# Altium PCB Trung PX4 Flight Controller PCB.PcbDoc (part 1 of 2)
Units mm, origin at the board's own origin, x right, y up, seen from the top; angles counter-clockwise.
Board outline 69.46 x 68.69 mm, 4 copper layers (Top Signal, Power, GND, Bottom Signal), stack 1.683 mm thick; 113 components, 114 nets, 501 pads, 234 vias.
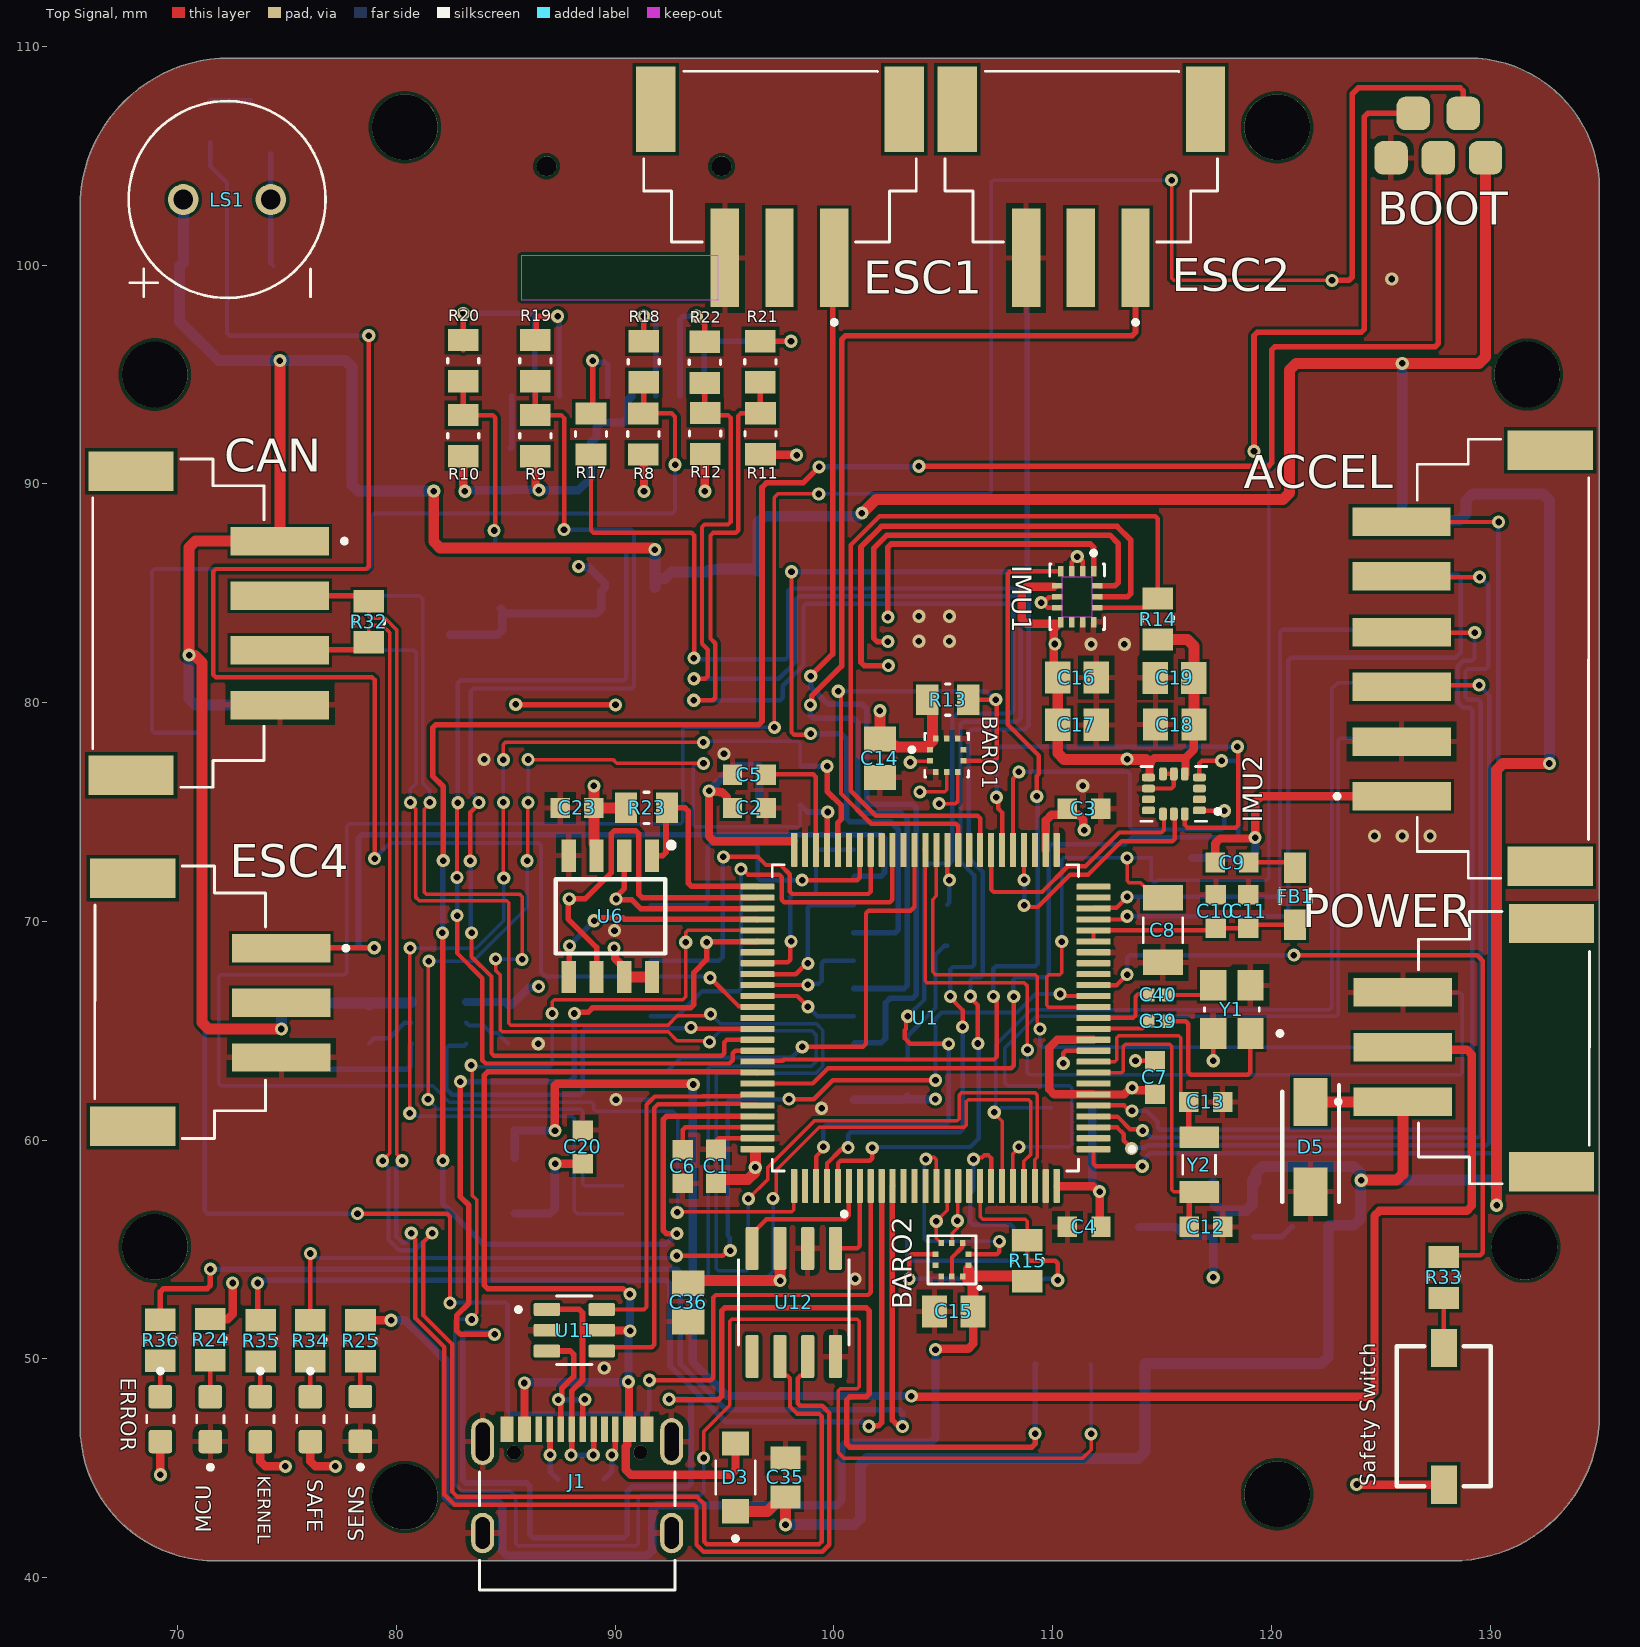
[diagram p0: Top Signal view]
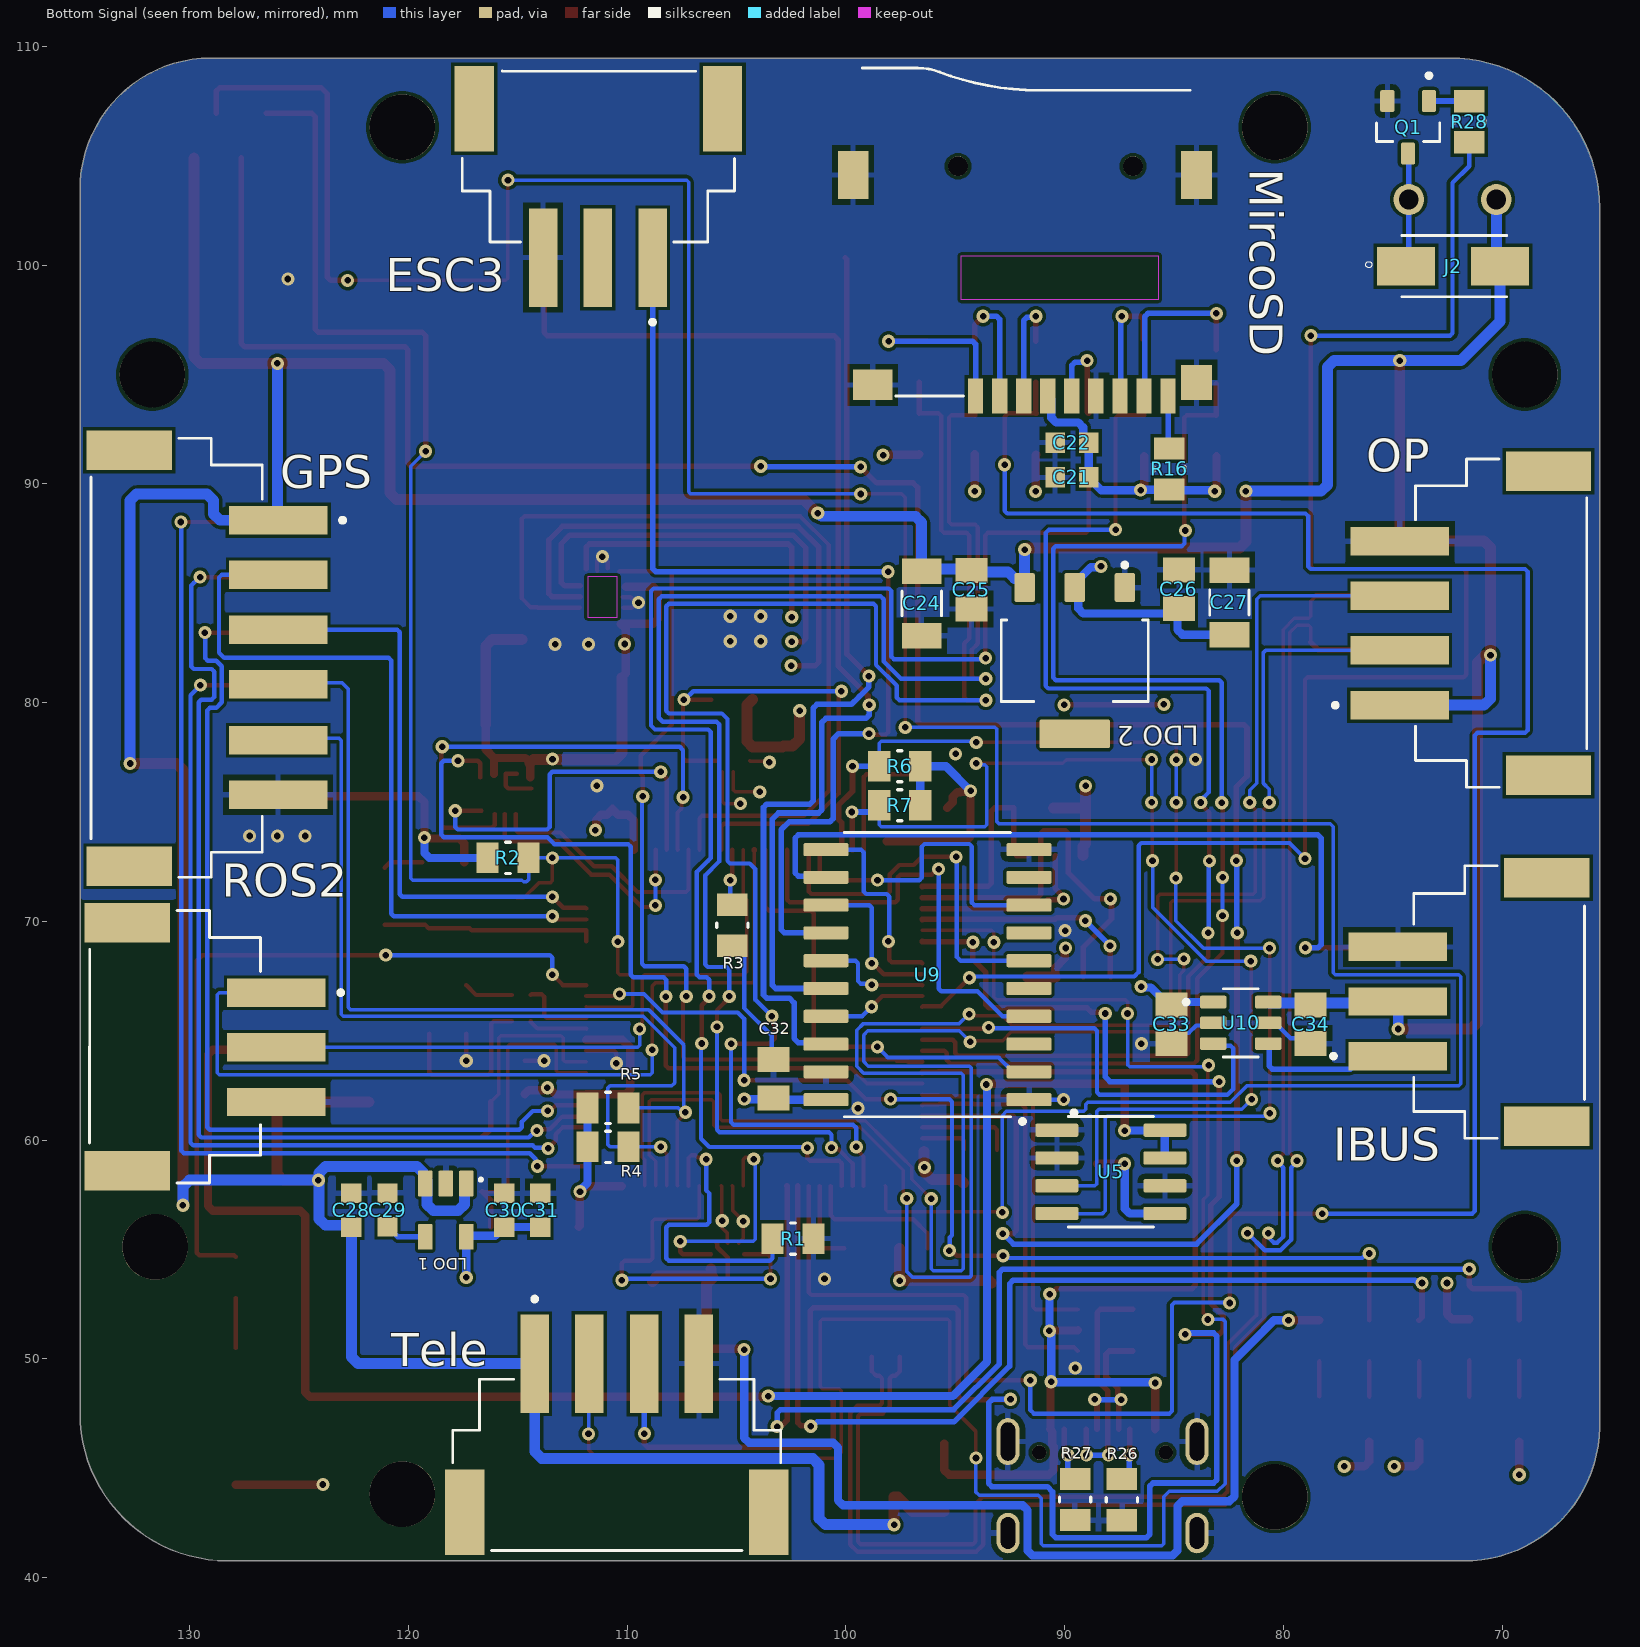
[diagram p1: Bottom Signal view, seen from below]
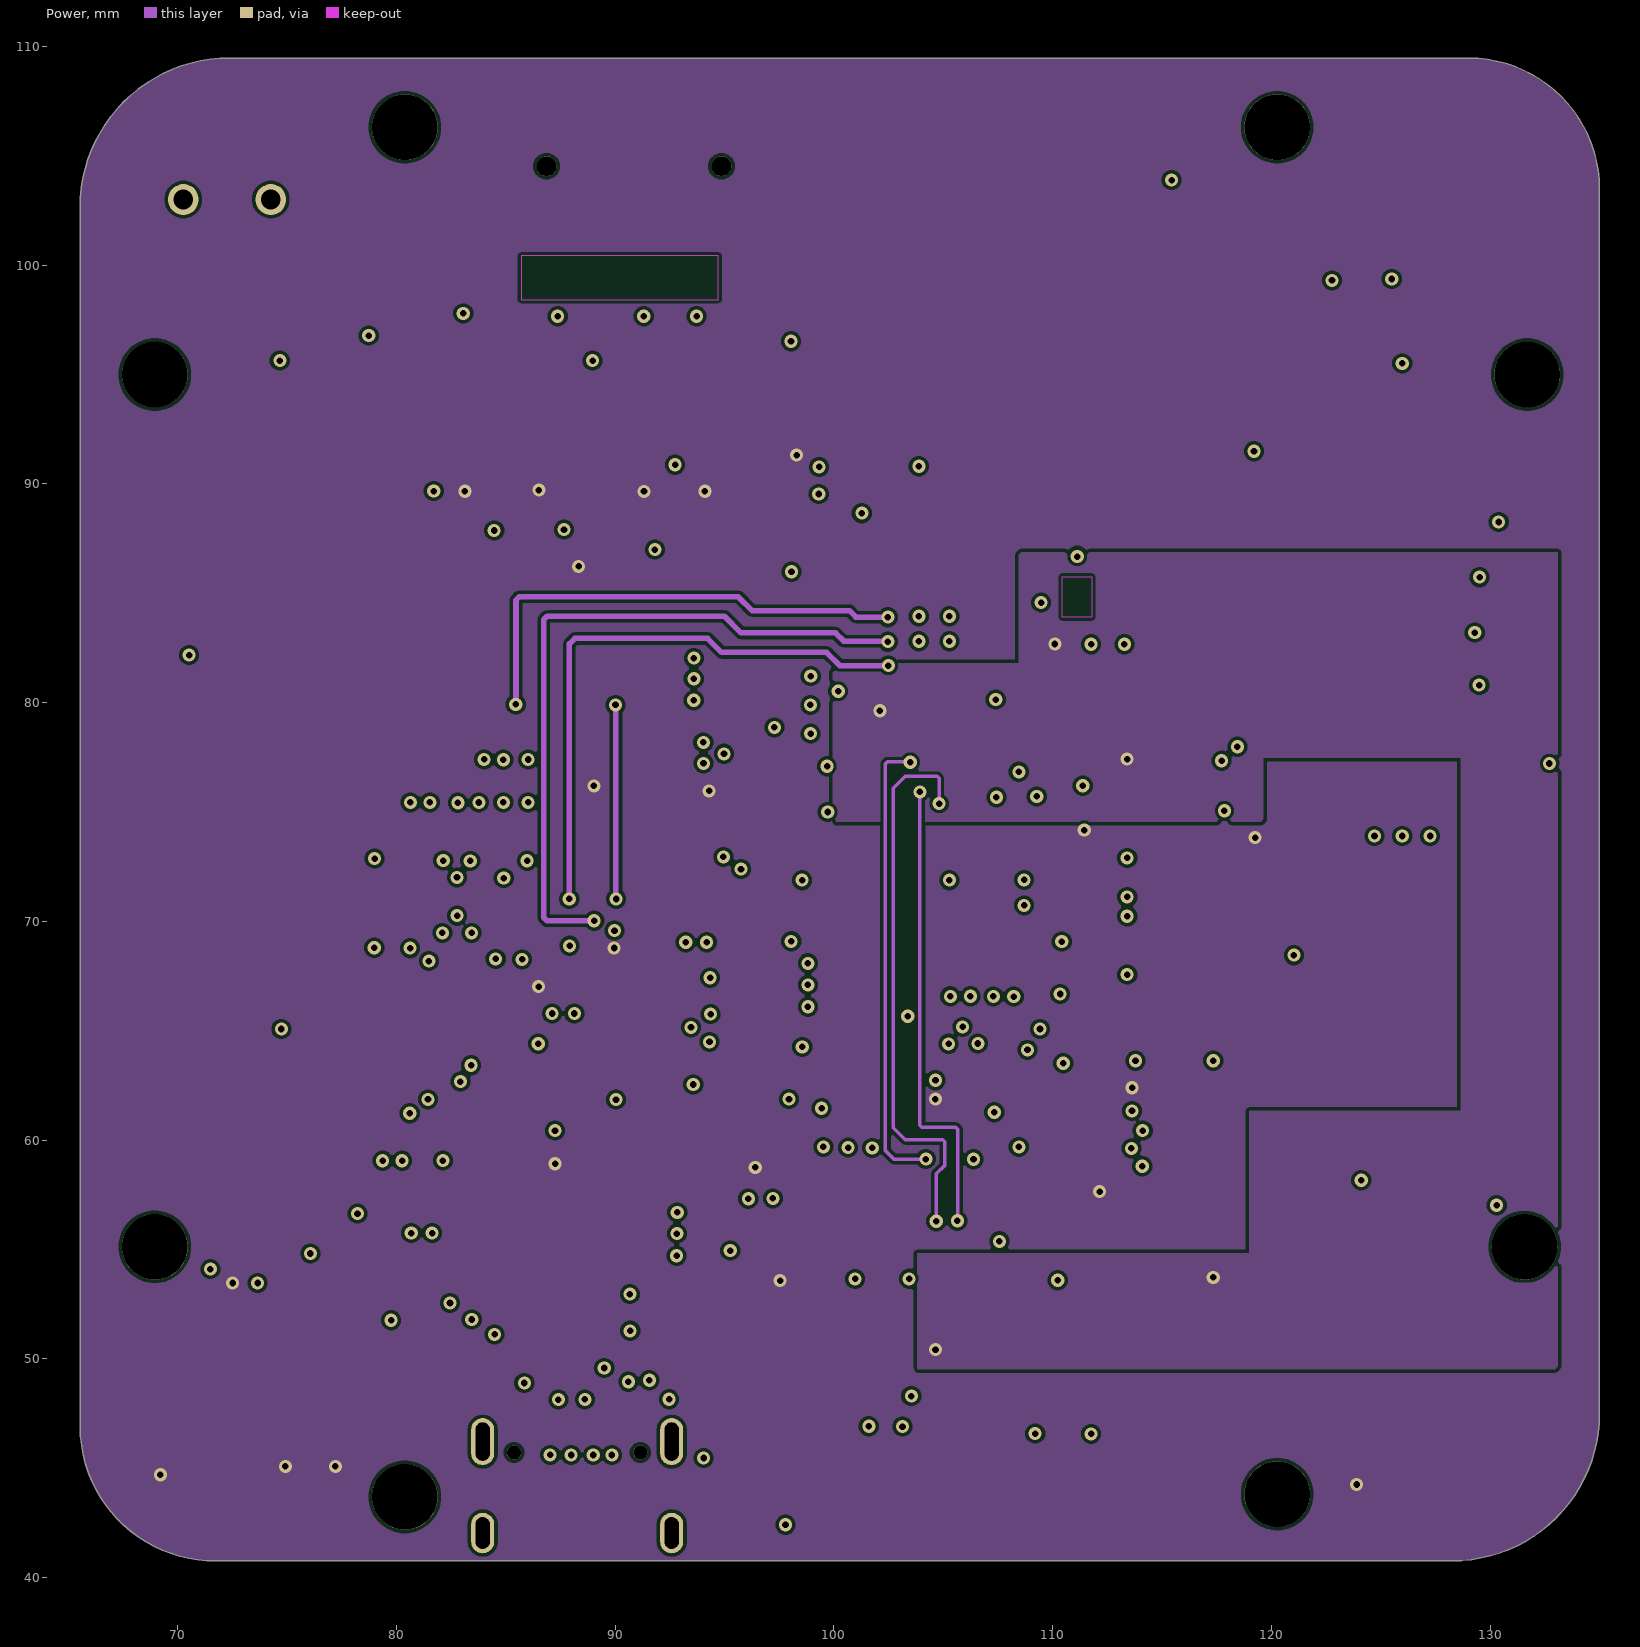
[diagram p2: Power]
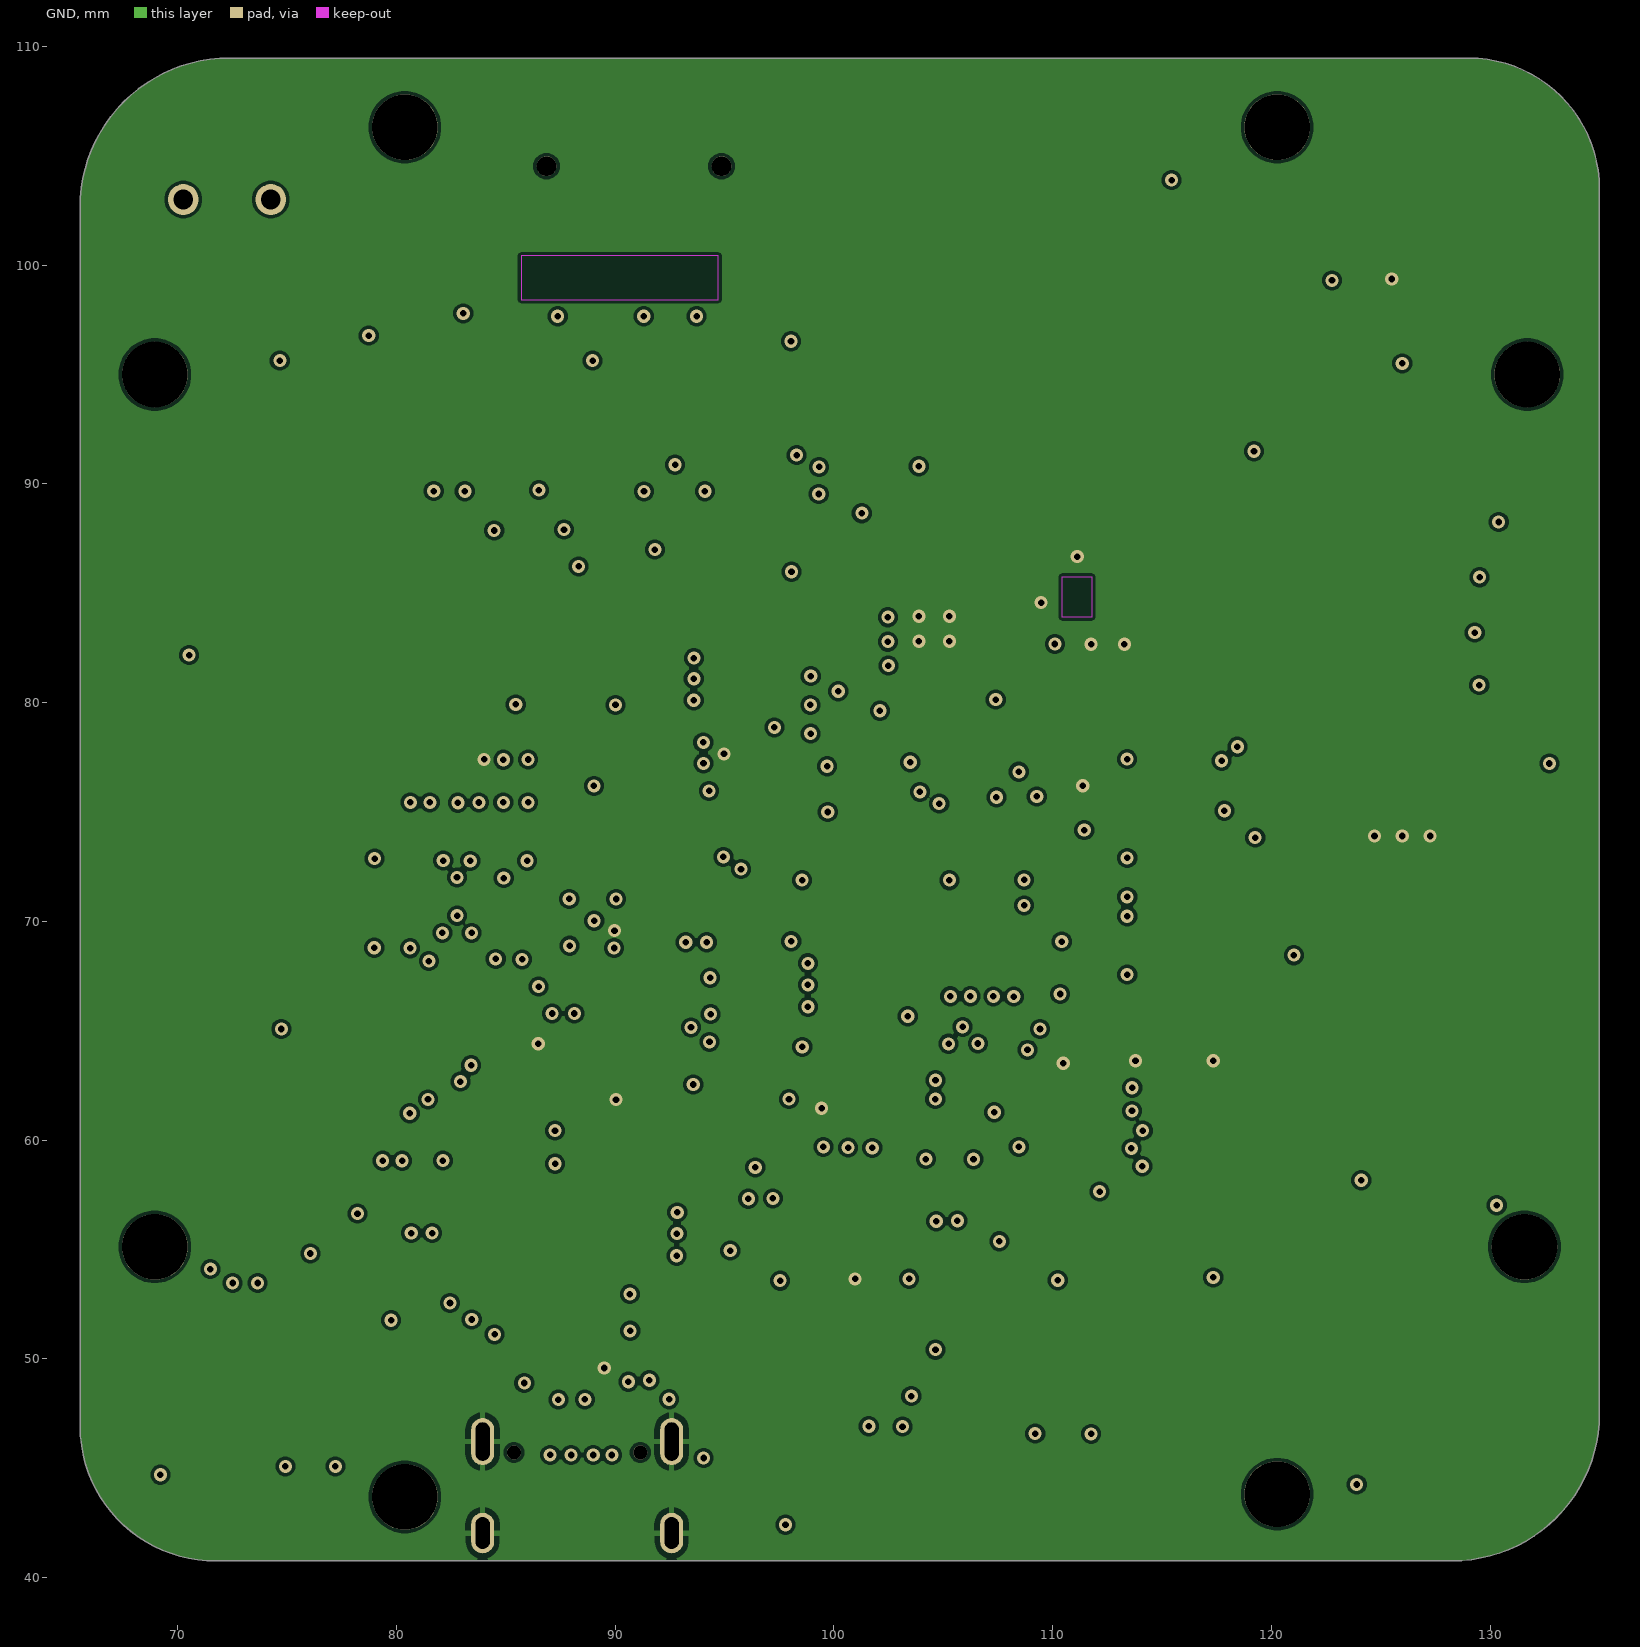
[diagram p3: GND]
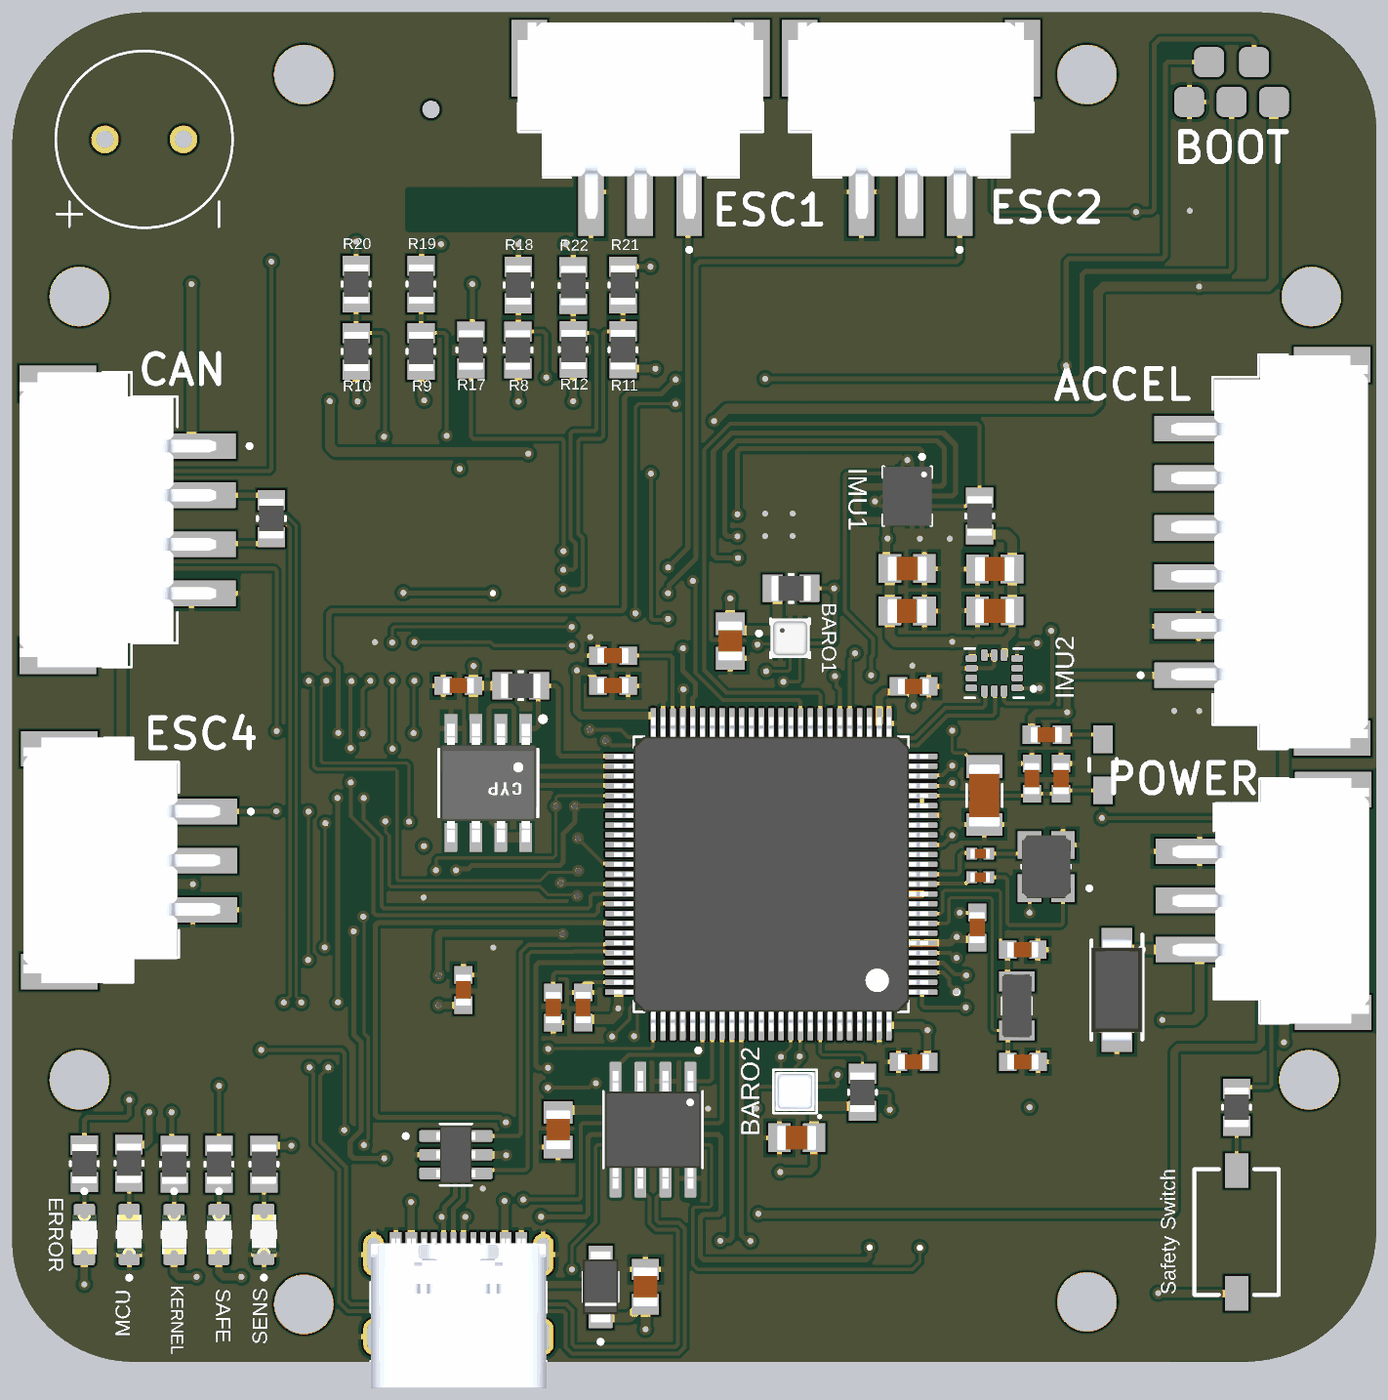
[diagram p5: 3D render of the assembled board from above, using the file's embedded part models]
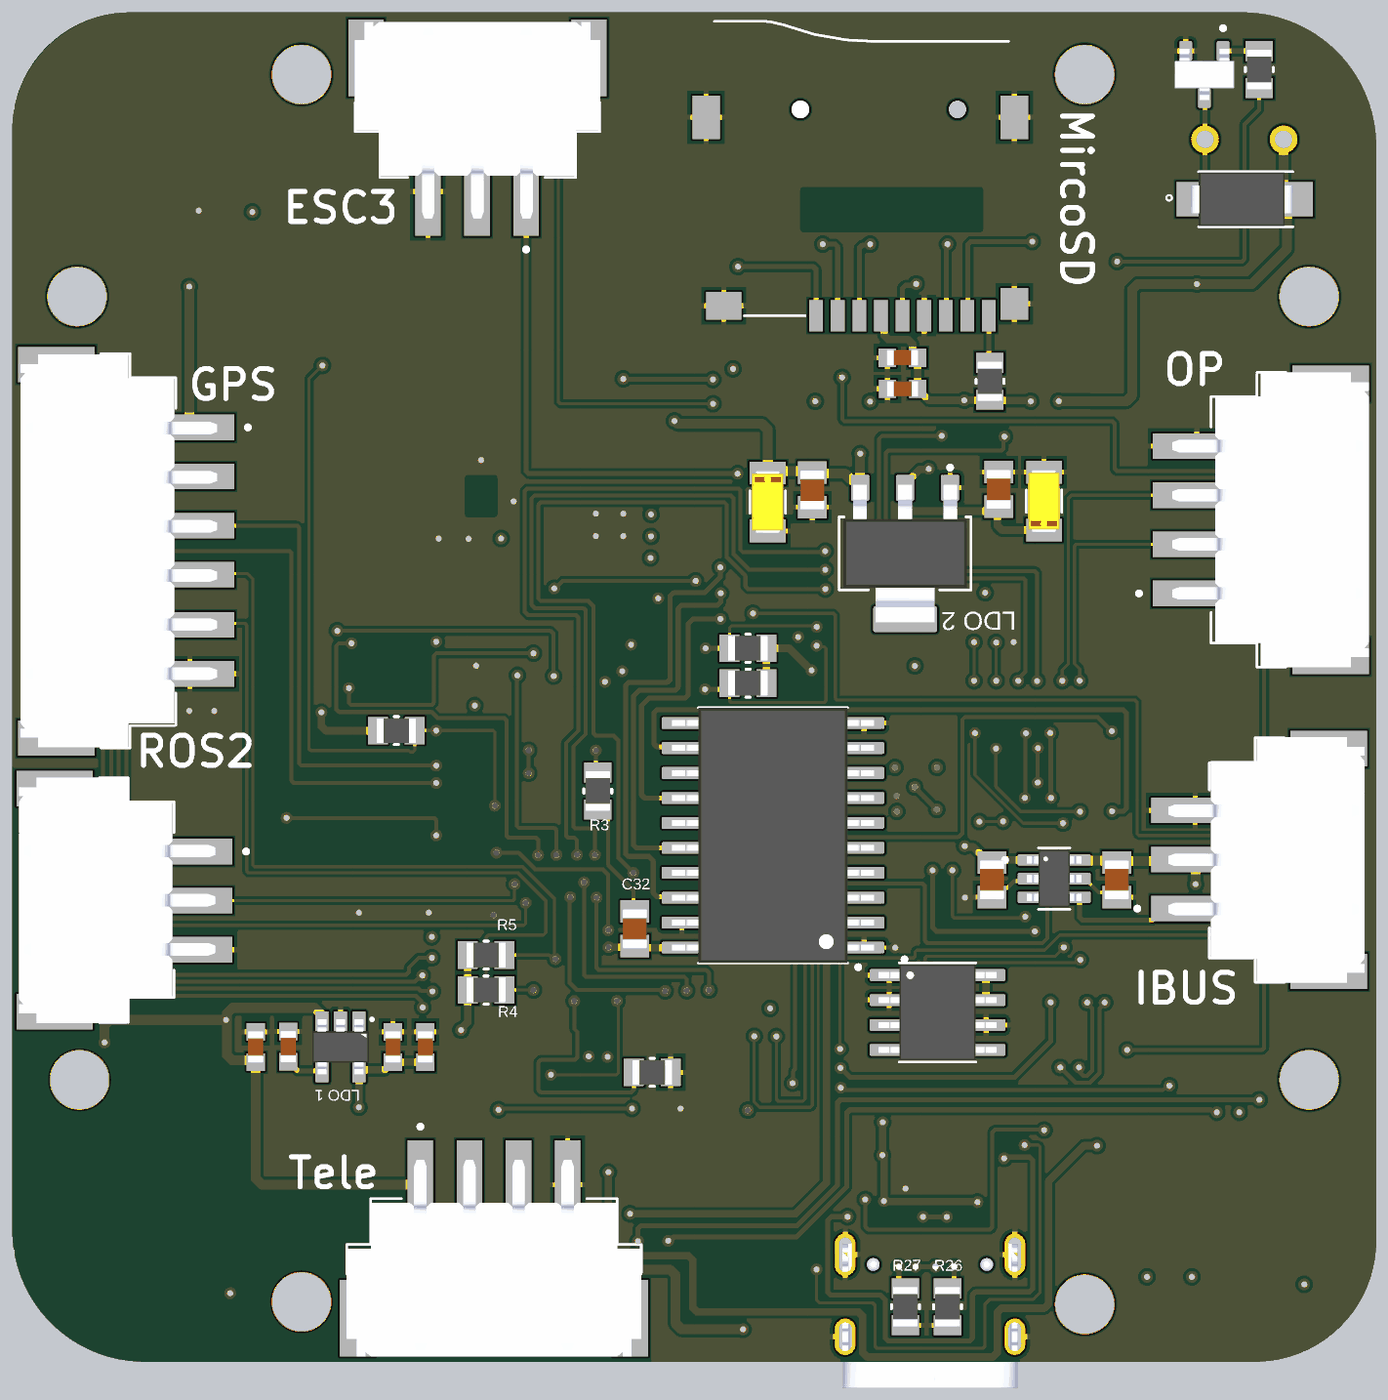
[diagram p6: 3D render of the assembled board from below, using the file's embedded part models]

## Layer stack, top to bottom
Top Solder: solder mask 0.0102, Solder Resist, Dk 3.5
Top Signal: signal copper 0.0356
Dielectric 2: prepreg 0.0711, PP-006, Dk 4.1
Power: signal copper 0.035
Dielectric 1: dielectric 1.4, FR-4, Dk 4.8
GND: signal copper 0.035
Dielectric 3: prepreg 0.0711, PP-006, Dk 4.1
Bottom Signal: signal copper 0.0356
Bottom Solder: solder mask 0.0102, Solder Resist, Dk 3.5

## Board outline
71.76,40.767 128.27,40.767 ccw(c128.27,47.498) 135.001,47.498 135.001,103.476 ccw(c129.015,103.476) 129.026,109.461 114.828,109.461 100.59,109.461 72.377,109.461 ccw(c72.365,102.641) 65.545,102.629 65.545,46.868 ccw(c71.709,46.931)

## Design rules (kind name [scope] priority, off if disabled: settings)
Clearance [All] p1: gap=0.15 ignorepadtopadclearanceinfootprint=FALSE except(0: Arc-Hole Track-Hole SMDPad-Hole THPad-Hole Via-Hole Fill-Hole Poly-Hole Region-Hole Text-Hole)
DiffPairsRouting [All] p1: maxlimit=0.254 minlimit=0.127 mostfreqgap=0.152 toplayer_minwidth=0.127 toplayer_maxwidth=0.381 toplayer_prefwidth=0.152 midlayer1_minwidth=0.127 midlayer1_maxwidth=0.381 midlayer1_prefwidth=0.152 midlayer2_minwidth=0.127 midlayer2_maxwidth=0.381 midlayer2_prefwidth=0.152 bottomlayer_minwidth=0.127 bottomlayer_maxwidth=0.381 bottomlayer_prefwidth=0.152 maxuncoupledlength=12.7
MatchedLengths [InNet('USB_CONN_N')or InNet('USB_CONN_P')] p1: tolerance=0.15 checknetsindiffpair=TRUE checkdiffpairvsdiffpair=FALSE checkxsignals=FALSE checkothers=FALSE
PolygonConnect [All] p1: thpad.connectstyle=Relief thpad.reliefconductorwidth=0.254 thpad.reliefentries=4 thpad.polygonreliefangle="90 Angle" thpad.airgapwidth=0.254 smdpad.connectstyle=Relief smdpad.reliefconductorwidth=0.254 smdpad.reliefentries=4 smdpad.polygonreliefangle="90 Angle" smdpad.airgapwidth=0.254 via.connectstyle=Direct via.reliefconductorwidth=0.254 via.reliefentries=4 via.polygonreliefangle="90 Angle" via.airgapwidth=0.254
RoutingVias [All] p1: holewidth=0.3 width=0.6 viastyle="Through Hole" minholewidth=0.3 minwidth=0.6 maxholewidth=0.3 maxwidth=0.6
SolderMaskExpansion ViaTenting [IsVia] p1: expansion=0.102 istentingtop=TRUE
SolderMaskExpansion [All] p2: expansion=0.102 istentingtop=FALSE
Width VBUS [InNet('VBUS')] p1: maxlimit=0.5 minlimit=0.152 preferedwidth=0.254 minimp=50.000000 maximp=50.000000 favimp=50.000000
Width Signal [Not(InNet('+3.3')or InNet('+5')or InNet('5V_SERVO')or InNet('BATT_VOLT')or InNet('VCC_3V3_SENS')or InNet('VBUS')or InNet('VBAT_IN'))] p2: maxlimit=0.254 minlimit=0.152 preferedwidth=0.2 minimp=50.000000 maximp=50.000000 favimp=50.000000
Width Power [InNet('+3.3')or InNet('+5')or InNet('5V_SERVO')or InNet('BATT_VOLT')or InNet('VCC_3V3_SENS')or InNet('VBAT_IN')] p3: maxlimit=1 minlimit=0.38 preferedwidth=0.5 minimp=50.000000 maximp=50.000000 favimp=50.000000
29 further rules are at their usual default settings.

## Classes and differential pairs
component class Sensor_FMU: BARO1 C14 C15 C16 C17 C18 C19 C20 C28 C29 C30 C31 D2 IMU1 IMU2 "LDO 1" R13 R14 R15 R25 U5
component class SD_FMU: C21 C22 C23 MircoSD R8 R9 R10 R11 R12 R16 R17 R18 R19 R20 R21 R22 R23 U6
component class PWM_FMU: C32 C33 C34 C36 U9 U10 U12
component class FMU_FMU: C1 C2 C3 C4 C5 C6 C7 C8 C9 C10 C11 C12 C13 C24 C25 C26 C27 C39 C40 D1 D4 D7 FB1 "LDO 2" R1 R2 R3 R4 R5 R6 R7 R24 R33 R34 R35 R36 S1 Servo U1 Y1 Y2
component class Connector_FMU: C35 D3 D5 IBUS J1 J2 J3 J4 J5 J6 J7 J8 J10 J12 J14 J15 J16 LS1 Q1 R26 R27 R28 R32 Tele U11
differential pair USB_CONN: +USB_CONN_P -USB_CONN_N
differential pair CAN: +CAN_P -CAN_N
differential pair OTG_FS: +OTG_FS_P -OTG_FS_N

## Components (designator, comment, footprint, x,y, rotation, side; value= is the part's Value field where it differs from the comment)
ACCEL "FPGA Accel" JST_S6B-XH-SM4-TB 132.754,79.467 r90 top (schematic designator J14)
BARO1 "BMP390L" XDCR_BMP390L 105.156,77.597 r90 top (schematic designator U4)
BARO2 "BMP581" BMP581 105.401,54.527 r270 top (schematic designator U3)
BOOT "Pad Connector" "Pad Connector PCB" 125.349,106.426 r180 top (schematic designator J16)
C1 "100nF" CAPC1608X90N 94.615,58.801 r270 top
C2 "100nF" CAPC1608X90N 96.139,75.184 r180 top
C3 "100nF" CAPC1608X90N 111.435,75.148 r180 top
C4 "100nF" CAPC1608X90N 111.444,56.035 r0 top
C5 "2.2uF" CAPC1608X90N 96.139,76.708 r0 top
C6 "2.2uF" CAPC1608X90N 93.091,58.793 r90 top
C7 "100nF" CAPC1608X90N 114.681,62.865 r270 top
C8 "100nF" CAPC3216X127N 115.047,69.597 r90 top
C9 "1uF" CAPC1608X90N 118.207,72.688 r180 top
C10 "100nF" CAPC1608X90N 117.467,70.451 r270 top
C11 "1uF" CAPC1608X90N 118.95,70.451 r270 top
C12 "10pF" CAPC1608X90N 117.009,56.035 r0 top
C13 "10pF" CAPC1608X90N 117,61.742 r0 top
C14 "100nF" CAPC2012X135N#1 102.108,77.461 r90 top
C15 "100nF" CAPC2012X135N#1 105.49,52.167 r0 top
C16 "100nF" CAPC2012X135N#1 111.116,81.144 r180 top
C17 "2.2uF" CAPC2012X152N 111.116,78.985 r0 top
C18 "100nF" CAPC2012X135N#1 115.579,78.996 r0 top
C19 "2.2uF" CAPC2012X152N 115.576,81.124 r180 top
C20 "100nF" CAPC1608X90N 88.519,59.69 r270 top
C21 "100nF" CAPC1608X90N 89.662,90.297 r180 bottom
C22 "100nF" CAPC1608X90N 89.665,91.882 r180 bottom
C23 "100nF" CAPC1608X90N 88.265,75.184 r0 top
C24 "10uF" CAPC3216X110N 96.53,84.535 r270 bottom
C25 "100nF" CAPC2012X135N#1 94.26,85.153 r90 bottom
C26 "100nF" CAPC2012X135N#1 84.77,85.181 r270 bottom
C27 "10uF" CAPC3216X110N 82.463,84.58 r90 bottom
C28 "1uF" CAPC1608X90N 122.601,56.795 r270 bottom
C29 "22nF" CAPC1608X90N 120.95,56.803 r270 bottom
C30 "100nF" CAPC1608X90N 115.616,56.795 r270 bottom
C31 "1uF" CAPC1608X90N 113.965,56.795 r270 bottom
C32 "100nF" CAPC2012X135N#1 103.302,62.806 r270 bottom
C33 "100nF" CAPC2012X135N#1 85.105,65.299 r90 bottom
C34 "100nF" CAPC2012X135N#1 78.755,65.299 r90 bottom
C35 "10uF" CAPC2012X135N#2 97.79,44.577 r270 top
C36 "100nF" CAPC2012X135N#1 93.345,52.578 r90 top
C39 "8pF" CAPC1005X55N 114.835,65.432 r0 top
C40 "8pF" CAPC1005X55N 114.835,66.633 r0 top
CAN "CAN" JST_S4B-XH-SM4-TB 67.876,83.633 r270 top (schematic designator J4)
D3 "SS34L" SODFL3618X143N 95.504,44.577 r90 top
D5 "SMAJ5.0A" DIOM5026X229N 121.793,59.69 r270 top
ERROR "Error LED" LEDSC125X200X90-2N 69.215,47.244 r270 top (schematic designator D7)
ESC1 "ESC1" JST_S3B-XH-SM4-TB 96.268,107.13 r180 top (schematic designator J3)
ESC2 "ESC2" JST_S3B-XH-SM4-TB 110.042,107.13 r180 top (schematic designator J5)
ESC3 "ESC3" JST_S3B-XH-SM4-TB 112.585,107.141 r0 bottom (schematic designator J7)
ESC4 "ESC4" JST_S3B-XH-SM4-TB 67.945,65.024 r270 top (schematic designator J8)
FB1 "600" WE-CBA_0805_W4.0 121.084,71.151 r270 top
GPS "GPS" JST_S6B-XH-SM4-TB 132.754,84.586 r270 bottom (schematic designator J6)
IBUS "iA6B i-Bus" JST_S3B-XH-SM4-TB 67.96,67.585 r90 bottom (schematic designator J13)
IMU1 "ICM-42670-P" XDCR_ICM-42670-P 111.125,84.836 r270 top (schematic designator MT1)
IMU2 "ICM-42688-P" PQFN50P300X250X97-14N 115.548,75.823 r180 top (schematic designator U2)
J1 "USB Type-C 16 Pin SMD" AMPHENOL_10155435-00011LF 88.267,42.037 r0 top
J2 "SS14" SMA 72.39,99.949 r180 bottom
KERNEL "Kernel LED" LEDSC125X200X90-2N 73.787,47.244 r270 top (schematic designator D6)
"LDO 1" "RT9193-33GB" SOT94P279X129-5N 118.283,56.795 r270 bottom (schematic designator U8)
"LDO 2" "AMS1117-3.3" SOT229P700X180-4N 89.535,81.915 r0 bottom (schematic designator U7)
LS1 "Passive Buzzer 9mm" XDCR_AT-0927-TT-2-R 72.263,102.997 r90 top
MCU "MCU LED" LEDSC125X200X90-2N 71.501,47.244 r90 top (schematic designator D1)
MircoSD "ST-TF-003A" SUNTECH_ST-TF-003A 90.548,99.351 r0 bottom (schematic designator P1)
OP "MTF-02P" JST_S4B-XH-SM4-TB 67.876,83.633 r90 bottom (schematic designator J10)
POWER "Power Input" JST_S3B-XH-SM4-TB 132.81,65.501 r90 top (schematic designator J15)
Q1 "MMBT3904" TRANS_MMBT3904 74.295,106.299 r270 bottom
R1 "10K" RESC2013X65N 102.413,55.499 r180 bottom
R2 "10K" RESC2013X65N 115.443,72.898 r0 bottom
R3 "10K" RESC2013X65N 105.184,69.821 r270 bottom
R4 "4K7" RESC2013X65N 110.871,61.468 r180 bottom
R5 "4K7" RESC2013X65N 110.871,59.69 r180 bottom
R6 "4K7" RESC2013X65N 97.536,77.089 r0 bottom
R7 "4K7" RESC2013X65N 97.536,75.311 r0 bottom
R8 "10K" RESC2013X65N 91.296,92.276 r90 top
R9 "10K" RESC2013X65N 86.36,92.202 r90 top
R10 "10K" RESC2013X65N 83.058,92.202 r90 top
R11 "10K" RESC2013X65N 96.648,92.288 r90 top
R12 "10K" RESC2013X65N 94.115,92.297 r90 top
R13 "10K" RESC2013X65N 105.207,80.137 r0 top
R14 "10K" RESC2013X65N 114.808,83.82 r90 top
R15 "10K" RESC2013X65N 108.839,54.483 r90 top
R16 "10K" RESC2013X65N 85.217,90.678 r270 bottom
R17 "22" RESC2013X65N 88.9,92.278 r90 top
R18 "22" RESC2013X65N 91.313,95.58 r90 top
R19 "22" RESC2013X65N 86.36,95.631 r90 top
R20 "22" RESC2013X65N 83.058,95.631 r90 top
R21 "22" RESC2013X65N 96.647,95.58 r90 top
R22 "22" RESC2013X65N 94.107,95.555 r90 top
R23 "10K" RESC2013X65N 91.44,75.184 r0 top
R24 "220" RESC2013X65N 71.489,50.876 r270 top
R25 "220" RESC2013X65N 78.362,50.826 r270 top
R26 "5.1K" RESC2013X65N 87.376,43.561 r90 bottom
R27 "5.1K" RESC2013X65N 89.518,43.569 r90 bottom
R28 "1K" RESC2013X65N 71.501,106.553 r270 bottom
R32 "120" RESC2013X65N 78.74,83.693 r270 top
R33 "220" RESC2013X65N 127.889,53.721 r90 top
R34 "220" RESC2013X65N 76.072,50.827 r90 top
R35 "220" RESC2013X65N 73.798,50.822 r90 top
R36 "220" RESC2013X65N 69.215,50.851 r90 top
ROS2 "ROS2 uXRCE-DDS" JST_S3B-XH-SM4-TB 132.842,62.992 r270 bottom (schematic designator J12)
SAFE "Safety LED" LEDSC125X200X90-2N 76.073,47.244 r270 top (schematic designator D4)
"Safety Switch" "Safety ARM" 434781025816 127.889,47.371 r90 top (schematic designator S1)
SENS "Sensor LED" LEDSC125X200X90-2N 78.359,47.253 r90 top (schematic designator D2)
Tele "Telemetry" JST_S4B-XH-SM4-TB 110.47,42.984 r180 bottom (schematic designator J9)
U1 "STM32H743VIT6" QFP50P1600X1600X160-100N 104.189,65.584 r180 top
U5 "INA219AIDR" SOIC127P599X175-8N#1 87.884,58.547 r180 bottom
U6 "FM25V05-G" SOIC127P602X173-8N-1-V 89.789,70.231 r270 top
U9 "SN74LVC244ADWR" SOIC127P1030X265-20N 96.266,67.564 r0 bottom
U10 "SN74LVC1T45DBVR" SOT95P280X145-6N#1 81.945,65.36 r180 bottom
U11 "USBLC6-2SC6" SOT95P280X145-6N#2 88.138,51.308 r0 top
U12 "SN65HVD230DR" SOIC127P599X175-8N#2 98.171,52.578 r270 top
Y1 "Crystal 24MHz" XTAL_ABM8G-24.000MHZ-B4Y-T 118.194,65.974 r180 top
Y2 "Crystal 32.768kHz" XTAL_CC7V-T1A-32.768KHZ-7PF-100PPM-TA-QC 116.7,58.881 r270 top

## Footprints (in the part's own frame and the unit in brackets; to place one, negate y for a bottom-side part, rotate by r counter-clockwise, add the part's x,y. Pads: shape width x height; smd on the part's side, far side on the other; paste and mask are expansions set on the pad)
434781025816 [mm]
  rect 1.75x1.2 smd paste+0 mask+0.102: 1(-3.125,0) 2(3.125,0)
  silkscreen extent -3.2,-2.15 3.2,2.15
AMPHENOL_10155435-00011LF [mm]
  rect 0.6x1.15 smd: A1_B12(-3.2,4.745) A4_B9(-2.4,4.745) B1_A12(3.2,4.745) B4_A9(2.4,4.745)
  rect 0.3x1.15 smd: A5(-1.25,4.745) A6(-0.25,4.745) A7(0.25,4.745) A8(1.25,4.745) B5(1.75,4.745) B6(0.75,4.745) B7(-0.75,4.745) B8(-1.75,4.745)
  oval 1.05x2.15 hole 0.65 slot 1.75 at 90 deg: SH1(-4.32,4.18) SH2(4.32,4.18)
  oval 1.05x1.85 hole 0.65 slot 1.45 at 90 deg: SH3(-4.32,0) SH4(4.32,0)
  round 0.65 hole 0.65 unplated: ""(-2.89,3.68) ""(2.89,3.68)
  silkscreen extent -4.47,-2.6 4.47,2.79, body extent -4.47,-2.6 4.47,5, height 3.26
BMP581 [mm]
  rect 0.25x0.275 smd paste-1: 1(0.25,0.763) 2(-0.25,0.763) 6(-0.25,-0.763) 7(0.25,-0.763)
  rect 0.275x0.25 smd paste-0.025: 3(-0.763,0.5) 4(-0.763,0) 5(-0.763,-0.5) 8(0.763,-0.5) 9(0.763,0) 10(0.763,0.5)
  silkscreen extent -1.1,-1.1 1.33,1.3, body extent -1,-1 1,1, height 0.8
CAPC1005X55N [mm]
  rect 0.53x0.6 smd paste+0 mask+0.102: 1(-0.437,0) 2(0.437,0)
  body extent -0.5,-0.25 0.5,0.25, height 0.55
CAPC1608X90N [mm]
  rect 0.89x0.93 smd: 1(-0.77,0) 2(0.77,0)
  body extent -0.8,-0.4 0.8,0.4, height 0.9
CAPC2012X135N#1 [mm]
  rect 1.15x1.47 smd: 1(-0.88,0) 2(0.88,0)
  body extent -1,-0.62 1,0.63, height 1.35
CAPC2012X135N#2 [mm]
  rect 1.05x1.38 smd: 1(-0.888,0) 2(0.888,0)
  body extent -1,-0.62 1,0.62, height 1.35
CAPC2012X152N [mm]
  rect 1.16x1.47 smd paste+0 mask+0.102: 1(-0.88,0) 2(0.88,0)
  body extent -1,-0.63 1,0.63, height 1.52
CAPC3216X110N [mm]
  rect 1.16x1.82 smd: 1(-1.475,0) 2(1.475,0)
  silkscreen extent -0.57,-0.9 0.57,0.9, body extent -1.6,-0.8 1.6,0.8, height 1.8
CAPC3216X127N [mm]
  rect 1.16x1.82 smd: 1(-1.475,0) 2(1.475,0)
  silkscreen extent -0.57,-0.9 0.57,0.9, body extent -1.6,-0.8 1.6,0.8, height 1.27
DIOM5026X229N [mm]
  rect 2.2x1.55 smd paste+0 mask+0.102: 1(-2.05,0) 2(2.05,0)
  silkscreen extent -2.82,-1.3 2.52,1.3, body extent -2.61,-1.3 2.61,1.3, height 2.4
JST_S3B-XH-SM4-TB [mm]
  rect 1.3x4.5 smd: 1(-3.75,6.8) 2(-1.25,6.8) 3(1.25,6.8)
  rect 1.8x3.9 smd: SH1(-6.95,0) SH2(4.4,0.001)
  silkscreen extent -7.5,-1.73 4.95,9.85, body extent -7.52,-1.82 4.98,8.18, height 6.12
JST_S4B-XH-SM4-TB [mm]
  rect 1.3x4.5 smd: 1(-3.75,6.8) 2(-1.25,6.8) 3(1.25,6.8) 4(3.75,6.8)
  rect 1.8x3.9 smd: SH1(-6.95,0) SH2(6.95,0)
  silkscreen extent -7.5,-1.75 7.5,9.85, body extent -7.5,-1.95 7.5,8.05, height 6.12
JST_S6B-XH-SM4-TB [mm]
  rect 1.3x4.5 smd: 1(-3.75,6.8) 2(-1.25,6.8) 3(1.25,6.8) 4(3.75,6.8) 5(6.3,6.804) 6(8.8,6.804)
  rect 1.8x3.9 smd: SH1(-6.95,0) SH2(12.065,0)
  silkscreen extent -7.5,-1.76 12.57,9.85, body extent -7.46,-1.82 12.54,8.18, height 6.12
LEDSC125X200X90-2N [mm]
  rrect25% 1.07x1.08 smd: A(1.025,0) C(-1.025,0)
  silkscreen extent -2.3,-0.62 0.17,0.62, body extent -1,-0.63 1,0.63, height 0.7
"Pad Connector PCB" [mil]
  rrect50% 60x60 smd: 1(-175,60) 2(-135,-20) 3(-90,60) 4(-45,-20) 5(-5,60)
PQFN50P300X250X97-14N [mm]
  rrect50% 0.59x0.35 smd mask+0: 1(-1.165,0.75) 2(-1.165,0.25) 3(-1.165,-0.25) 4(-1.165,-0.75) 8(1.165,-0.75) 9(1.165,-0.25) 10(1.165,0.25) 11(1.165,0.75)
  rrect50% 0.35x0.59 smd mask+0: 5(-0.5,-0.915) 6(0,-0.915) 7(0.5,-0.915) 12(0.5,0.915) 13(0,0.915) 14(-0.5,0.915)
  silkscreen extent -2.1,-1.25 1.5,1.25
QFP50P1600X1600X160-100N [mm]
  rrect25% 1.56x0.28 smd: 1(-7.68,6) 2(-7.68,5.5) 3(-7.68,5) 4(-7.68,4.5) 5(-7.68,4) 6(-7.68,3.5) 7(-7.68,3) 8(-7.68,2.5) 9(-7.68,2) 10(-7.68,1.5) 11(-7.68,1) 12(-7.68,0.5) 13(-7.68,0) 14(-7.68,-0.5) 15(-7.68,-1) 16(-7.68,-1.5) 17(-7.68,-2) 18(-7.68,-2.5) 19(-7.68,-3) 20(-7.68,-3.5) 21(-7.68,-4) 22(-7.68,-4.5) 23(-7.68,-5) 24(-7.68,-5.5) 25(-7.68,-6) 51(7.68,-6) 52(7.68,-5.5) 53(7.68,-5) 54(7.68,-4.5) 55(7.68,-4) 56(7.68,-3.5) 57(7.68,-3) 58(7.68,-2.5) 59(7.68,-2) 60(7.68,-1.5) 61(7.68,-1) 62(7.68,-0.5) 63(7.68,0) 64(7.68,0.5) 65(7.68,1) 66(7.68,1.5) 67(7.68,2) 68(7.68,2.5) 69(7.68,3) 70(7.68,3.5) 71(7.68,4) 72(7.68,4.5) 73(7.68,5) 74(7.68,5.5) 75(7.68,6)
  rrect25% 0.28x1.56 smd: 26(-6,-7.68) 27(-5.5,-7.68) 28(-5,-7.68) 29(-4.5,-7.68) 30(-4,-7.68) 31(-3.5,-7.68) 32(-3,-7.68) 33(-2.5,-7.68) 34(-2,-7.68) 35(-1.5,-7.68) 36(-1,-7.68) 37(-0.5,-7.68) 38(0,-7.68) 39(0.5,-7.68) 40(1,-7.68) 41(1.5,-7.68) 42(2,-7.68) 43(2.5,-7.68) 44(3,-7.68) 45(3.5,-7.68) 46(4,-7.68) 47(4.5,-7.68) 48(5,-7.68) 49(5.5,-7.68) 50(6,-7.68) 76(6,7.68) 77(5.5,7.68) 78(5,7.68) 79(4.5,7.68) 80(4,7.68) 81(3.5,7.68) 82(3,7.68) 83(2.5,7.68) 84(2,7.68) 85(1.5,7.68) 86(1,7.68) 87(0.5,7.68) 88(0,7.68) 89(-0.5,7.68) 90(-1,7.68) 91(-1.5,7.68) 92(-2,7.68) 93(-2.5,7.68) 94(-3,7.68) 95(-3.5,7.68) 96(-4,7.68) 97(-4.5,7.68) 98(-5,7.68) 99(-5.5,7.68) 100(-6,7.68)
  silkscreen extent -9.54,-7 7,7, body extent -8,-8 8,8, height 1.6
RESC2013X65N [mil]
  rect 40x55 smd paste+0 mask+4.02: 1(-37,0) 2(37,0)
  silkscreen extent -4,-28 4,28, body extent -39,-25 39,25, height 24
SMA [mm]
  rect 2.65x1.75 smd paste+0 mask+0.102: P1(-2,0) P2(2.3,0)
  silkscreen extent -3.84,-1.4 2.6,1.4, body extent -2.6,-1.36 2.6,1.36, height 2.5
SODFL3618X143N [mm]
  rect 1.11x1.22 smd paste+0 mask+0.102: A(1.55,0) C(-1.55,0)
  silkscreen extent -2.89,-0.9 0.75,0.9, body extent -1.8,-0.9 1.8,0.9, height 1.43
SOIC127P599X175-8N#1 [mm]
  rrect25% 1.97x0.6 smd paste+0 mask+0.102: 1(-2.47,1.905) 2(-2.47,0.635) 3(-2.47,-0.635) 4(-2.47,-1.905) 5(2.47,-1.905) 6(2.47,-0.635) 7(2.47,0.635) 8(2.47,1.905)
  silkscreen extent -4.14,-2.52 1.95,2.52, body extent -3,-2.45 3,2.45, height 1.75
SOIC127P599X175-8N#2 [mm]
  rrect25% 1.97x0.6 smd paste+0 mask+0: 1(-2.47,1.905) 2(-2.47,0.635) 3(-2.47,-0.635) 4(-2.47,-1.905) 5(2.47,-1.905) 6(2.47,-0.635) 7(2.47,0.635) 8(2.47,1.905)
  silkscreen extent -4.14,-2.53 1.95,2.53, body extent -3,-2.45 3,2.45, height 1.75
SOIC127P602X173-8N-1-V [mm] "SOIC,1.27mm pitch;8 pin,3.899mm W X 4.889mm L X 1.727mm H body"
  rect 1.47x0.65 smd paste+0 mask+0: 1(-2.77,1.905) 2(-2.77,0.635) 3(-2.77,-0.635) 4(-2.77,-1.905) 5(2.77,-1.905) 6(2.77,-0.635) 7(2.77,0.635) 8(2.77,1.905)
  silkscreen extent -3.38,-2.5 1.7,2.91, body extent -3.01,-2.44 3.01,2.44, height 1.74
SOIC127P1030X265-20N [mm]
  rrect25% 2.06x0.6 smd paste+0 mask+0.102: 1(-4.64,5.715) 2(-4.64,4.445) 3(-4.64,3.175) 4(-4.64,1.905) 5(-4.64,0.635) 6(-4.64,-0.635) 7(-4.64,-1.905) 8(-4.64,-3.175) 9(-4.64,-4.445) 10(-4.64,-5.715) 11(4.64,-5.715) 12(4.64,-4.445) 13(4.64,-3.175) 14(4.64,-1.905) 15(4.64,-0.635) 16(4.64,0.635) 17(4.64,1.905) 18(4.64,3.175) 19(4.64,4.445) 20(4.64,5.715)
  silkscreen extent -6.8,-6.5 3.8,6.5, body extent -5.15,-6.5 5.15,6.5, height 2.65
SOT94P279X129-5N [mm]
  rrect12% 1.17x0.67 smd: 1(-1.22,0.94) 2(-1.22,0) 3(-1.22,-0.94) 4(1.22,-0.94) 5(1.22,0.94)
  silkscreen extent -1.47,1.53 -1.33,1.67, body extent -1.4,-1.45 1.4,1.45, height 1.3
SOT95P280X145-6N#1 [mm]
  rrect25% 1.21x0.58 smd: 1(-1.255,0.95) 2(-1.255,0) 3(-1.255,-0.95) 4(1.255,-0.95) 5(1.255,0) 6(1.255,0.95)
  silkscreen extent -2.6,-1.56 0.8,1.56, body extent -1.4,-1.45 1.4,1.45, height 1.45
SOT95P280X145-6N#2 [mm]
  rrect25% 1.21x0.59 smd: 1(-1.255,0.95) 2(-1.255,0) 3(-1.255,-0.95) 4(1.255,-0.95) 5(1.255,0) 6(1.255,0.95)
  silkscreen extent -2.65,-1.56 0.81,1.56, body extent -1.4,-1.46 1.4,1.46, height 0.4
SOT229P700X180-4N [mm]
  rrect15% 0.93x1.31 smd: 1(-2.29,-3.345) 2(0,-3.345) 3(2.29,-3.345)
  rrect15% 3.24x1.31 smd: 4(0,3.345)
  silkscreen extent -3.36,-4.47 3.36,1.86, body extent -3.15,-3.5 3.15,3.5, height 1.8
SUNTECH_ST-TF-003A [mm]
  rect 0.7x1.6 smd: 1(3.52,5.33) 2(2.42,5.33) 3(1.32,5.33) 4(0.22,5.33) 5(-0.88,5.33) 6(-1.98,5.33) 7(-3.08,5.33) 8(-4.18,5.33) 9(-5.28,5.33)
  rect 1.4x1.6 smd: G1(-6.58,4.73)
  rect 1.4x2.2 smd: G2(-6.58,-4.77) G3(9.12,-4.77)
  rect 1.8x1.4 smd: G4(8.22,4.83)
  round 0.9 hole 0.9 unplated: ""(-3.68,-5.17) ""(4.32,-5.17)
  Keep-Out Layer region: 4.172,-1.073 -4.833,-1.073 -4.833,0.928 4.172,0.928
  silkscreen extent -6.29,-9.66 8.7,5.33
TRANS_MMBT3904 [mm]
  rrect25% 1x0.65 smd paste+0 mask+0.102: 1(-1.2,0.95) 2(-1.2,-0.95) 3(1.2,0)
  silkscreen extent -2.46,-1.45 0.65,1.45, body extent -1.3,-1.52 1.3,1.52, height 1.3
WE-CBA_0805_W4.0 [mm]
  rect 1.4x1 smd paste+0 mask+0.102: 1(-1.3,0) 2(1.3,0)
  silkscreen extent -0.3,-0.7 0.3,0.7
XDCR_AT-0927-TT-2-R [mm]
  round 1.408 hole 0.9: N(0,-2) P(0,2)
  silkscreen extent -4.5,-4.5 4.5,4.5
XDCR_BMP390L [mm]
  rect 0.25x0.275 smd: 1(0.25,0.763) 2(-0.25,0.763) 6(-0.25,-0.763) 7(0.25,-0.763)
  rect 0.275x0.25 smd: 3(-0.763,0.5) 4(-0.763,0) 5(-0.763,-0.5) 8(0.763,-0.5) 9(0.763,0) 10(0.763,0.5)
  silkscreen extent -1,-1 1,1.69, body extent -1,-1 1,1, height 0.8
XDCR_ICM-42670-P [mm]
  rect 0.475x0.25 smd paste-1 mask+0.05: 1(-1.162,0.75) 2(-1.162,0.25) 3(-1.162,-0.25) 4(-1.162,-0.75) 8(1.162,-0.75) 9(1.162,-0.25) 10(1.162,0.25) 11(1.162,0.75)
  rect 0.25x0.475 smd paste-1 mask+0.05: 5(-0.5,-0.913) 6(0,-0.913) 7(0.5,-0.913) 12(0.5,0.913) 13(0,0.913) 14(-0.5,0.913)
  Keep-Out Layer region: 0.925,-0.675 -0.925,-0.675 -0.925,0.675 0.925,0.675
  silkscreen extent -2.1,-1.25 1.5,1.25, body extent -1.5,-1.25 1.5,1.25, height 0.81
XTAL_ABM8G-24.000MHZ-B4Y-T [mm]
  rect 1.2x1.4 smd: 1(-0.85,1.1) 2(-0.85,-1.1) 3(0.85,-1.1) 4(0.85,1.1)
  silkscreen extent -2.3,-0.08 1.25,1.2, body extent -1.24,-1.6 1.24,1.6, height 0.99
XTAL_CC7V-T1A-32.768KHZ-7PF-100PPM-TA-QC [mm]
  rect 1x1.8 smd: 1(-1.25,0) 2(1.25,0)
  silkscreen extent -0.43,-0.75 0.43,0.75, body extent -1.6,-0.75 1.6,0.75, height 0.9

## Part data
ACCEL GPS: library part S6B-XH-SM4-TB, "Connector Header Surface Mount, Right Angle 4 position 0.098 (2.50mm)", Package=None, Check_prices=https://www.snapeda.com/parts/S4B/XH/SM4/TB/JST/view-part/?ref=eda, MF="JST Sales", MP=S4B/XH/SM4/TB, SnapEDA_Link=https://www.snapeda.com/parts/S4B/XH/SM4/TB/JST/view-part/?ref=snap
BARO1: "Pressure Sensor 4.35PSI ~ 18.13PSI (30kPa ~ 125kPa) Absolute - - 10-WFLGA", Package=None, Check_prices=https://www.snapeda.com/parts/BMP390L/Bosch+Sensortec/view-part/?ref=eda, MF="Bosch Sensortec", MP=BMP390L, SnapEDA_Link=https://www.snapeda.com/parts/BMP390L/Bosch+Sensortec/view-part/?ref=snap
BARO2: "Very small, low-power and low noise 24-bit absolute barometric pressure sensor. This digital, high-performance sensor is ideally suited for a wide range of altitude tracking applications and offers outstanding design flexibility", Package=None, Check_prices=https://www.snapeda.com/parts/BMP581/Bosch/view-part/?ref=eda, MF=Bosch, MP=BMP581, SnapEDA_Link=https://www.snapeda.com/parts/BMP581/Bosch/view-part/?ref=snap
C1 C2 C3 C4 C5 C6 C7 C9 C10 C11 C12 C13 C20 C21 C22 C23 C28 C29 C30 C31: library part GRM188R71H104KA93D, "SMD Capacitor X7R(EIA) with Capacitance: 0.10uF Tol. 10%. Rated Voltage: 50Vdc", Package="1608 Murata", Check_prices=https://www.snapeda.com/parts/GRM188R71H104KA93D/Murata/view-part/?ref=eda, MF=Murata, MP=GRM188R71H104KA93D, SnapEDA_Link=https://www.snapeda.com/parts/GRM188R71H104KA93D/Murata/view-part/?ref=snap
C8: library part 12061C104KAT2A, "0.1 ÂµF Â±10% 100V Ceramic Capacitor X7R 1206 (3216 Metric)", Package="3216 AVX", Check_prices=https://www.snapeda.com/parts/12061C104KAT2A/Kyocera/view-part/?ref=eda, MF="KYOCERA AVX", MP=12061C104KAT2A, SnapEDA_Link=https://www.snapeda.com/parts/12061C104KAT2A/Kyocera/view-part/?ref=snap
C14 C15 C16 C18 C25 C26 C32 C33 C34 C36: library part GRM21BR71H104KA01L, "ÐšÐ¾Ð½Ð´ÐµÐ½ÑÐ°Ñ‚Ð¾Ñ€ SMD X7R(EIA) Ñ Ñ‘Ð¼ÐºÐ¾ÑÑ‚ÑŒÑŽ: 0,10 Ð¼ÐºÐ¤ Â± 10%. ÐÐ¾Ð¼Ð¸Ð½Ð°Ð»ÑŒÐ½Ð¾Ðµ Ð½Ð°Ð¿Ñ€ÑÐ¶ÐµÐ½Ð¸Ðµ: 50 Ð’ Ð¿Ð¾ÑÑ‚Ð¾ÑÐ½Ð½Ð¾Ð³Ð¾ Ñ‚Ð¾ÐºÐ°", Package="805-2 Murata", Check_prices=https://www.snapeda.com/parts/GRM21BR71H104KA01L/Murata/view-part/?ref=eda, MF=Murata, MP=GRM21BR71H104KA01L, SnapEDA_Link=https://www.snapeda.com/parts/GRM21BR71H104KA01L/Murata/view-part/?ref=snap
C17 C19: library part 08053C225K4Z2A, "2.2 ÂµF Â±10% 25V Ceramic Capacitor X7R 0805 (2012 Metric)", Package="2012 AVX", Check_prices=https://www.snapeda.com/parts/08053C225K4Z2A/AVX/view-part/?ref=eda, MF=AVX, MP=08053C225K4Z2A, SnapEDA_Link=https://www.snapeda.com/parts/08053C225K4Z2A/AVX/view-part/?ref=snap
C24 C27: library part T491A106K010AT7280, "10 ÂµF Molded Tantalum Capacitors 10 V 1206 (3216 Metric) 3.8Ohm", Package="SMD-2 KEMET", Check_prices=https://www.snapeda.com/parts/T491A106K010AT7280/KEMET/view-part/?ref=eda, MF=KEMET, MP=T491A106K010AT7280, SnapEDA_Link=https://www.snapeda.com/parts/T491A106K010AT7280/KEMET/view-part/?ref=snap
C35: library part GRM21BR61C106KE15L, "10 ÂµF Â±10% 16V Ceramic Capacitor X5R 0805 (2012 Metric)", Package="805-2 Murata", Check_prices=https://www.snapeda.com/parts/GRM21BR61C106KE15L/Murata/view-part/?ref=eda, MF=Murata, MP=GRM21BR61C106KE15L, SnapEDA_Link=https://www.snapeda.com/parts/GRM21BR61C106KE15L/Murata/view-part/?ref=snap
C39 C40: library part C1005C0G1H080D050BA, "8 pF Â±0.5pF 50V Ceramic Capacitor C0G, NP0 0402 (1005 Metric)", Package="1005 TDK", Check_prices=https://www.snapeda.com/parts/C1005C0G1H080D050BA/TDK/view-part/?ref=eda, MF=TDK, MP=C1005C0G1H080D050BA, SnapEDA_Link=https://www.snapeda.com/parts/C1005C0G1H080D050BA/TDK/view-part/?ref=snap
CAN OP Tele: library part S4B-XH-SM4-TB, "Connector Header Surface Mount, Right Angle 4 position 0.098 (2.50mm)", Package=None, Check_prices=https://www.snapeda.com/parts/S4B/XH/SM4/TB/JST/view-part/?ref=eda, MF="JST Sales", MP=S4B/XH/SM4/TB, SnapEDA_Link=https://www.snapeda.com/parts/S4B/XH/SM4/TB/JST/view-part/?ref=snap
D3: "3A, 40V, Planar Schottky", Package="SUB SMA-2 Taiwan Semiconductor", Check_prices=https://www.snapeda.com/parts/SS34L/taiwan/view-part/?ref=eda, MF="Taiwan Semiconductor", MP=SS34L, SnapEDA_Link=https://www.snapeda.com/parts/SS34L/taiwan/view-part/?ref=snap
D5: "A 5.0V, 400W, uni-directional, SMA pkg TVS Diode", Package="DO-214 Bourns", Check_prices=https://www.snapeda.com/parts/SMAJ5.0A/Bourns/view-part/?ref=eda, MF=Bourns, MP=SMAJ5.0A, SnapEDA_Link=https://www.snapeda.com/parts/SMAJ5.0A/Bourns/view-part/?ref=snap
ERROR KERNEL MCU SAFE SENS: library part 5990110007F, "Red 633nm LED Indication - Discrete 2.1V 0805 (2012 Metric)", Package="0805 Dialight", Availability="In Stock", Check_prices=https://www.snapeda.com/parts/599-0110-007F/Dialight/view-part/?ref=eda, MF=Dialight, MP=599-0110-007F, Price=None, Purchase-URL=https://pricing.snapeda.com/search/part/599-0110-007F/?ref=eda, SnapEDA_Link=https://www.snapeda.com/parts/599-0110-007F/Dialight/view-part/?ref=snap
ESC1 ESC2 ESC3 ESC4 IBUS POWER ROS2: library part S3B-XH-SM3-TB, "Connector Header Surface Mount, Right Angle 4 position 0.098 (2.50mm)", Package=None, Check_prices=https://www.snapeda.com/parts/S4B/XH/SM4/TB/JST/view-part/?ref=eda, MF="JST Sales", MP=S4B/XH/SM4/TB, SnapEDA_Link=https://www.snapeda.com/parts/S4B/XH/SM4/TB/JST/view-part/?ref=snap
FB1: library part WE-CBA_0805, "FERRITE BEAD 560 OHM 0805 1LN", Package="0805 Wurth Elektronik", Check_prices=https://www.snapeda.com/parts/782853561/W%25C3%25BCrth+Elektronik+Midcom/view-part/?ref=eda, MF="WÃ¼rth Elektronik", MP=782853561, SnapEDA_Link=https://www.snapeda.com/parts/782853561/W%25C3%25BCrth+Elektronik+Midcom/view-part/?ref=snap
IMU1: Package=None, Availability=Unavailable, MP=ICM-42670-P, Price=None
IMU2: "Accelerometer, Gyroscope, 6 Axis Sensor Output", Package=None, Availability=Unavailable, MP=ICM-42688-P, Price=None
J1: library part 10155435-00011LF, Package=None, Availability=Unavailable, MP=10155435-00011LF, Price=None
J2: "Diode Schottky 40 V 1A Surface Mount DO-214AC (SMA)", Package="SMA-2 ON Semiconductor", Check_prices=https://www.snapeda.com/parts/SS14/Onsemi/view-part/?ref=eda, MF=onsemi, MP=SS14, SnapEDA_Link=https://www.snapeda.com/parts/SS14/Onsemi/view-part/?ref=snap
"LDO 1": "Linear Voltage Regulator IC Positive Fixed 1 Output 300mA TSOT-23-5", Package="SOT-23-5 Richtek", Check_prices=https://www.snapeda.com/parts/RT9193-33GB/Richtek+USA+Inc./view-part/?ref=eda, Digi-Key_Part_Number=1028-1014-2-ND, MF="Richtek USA", MP=RT9193-33GB, Purchase-URL=https://pricing.snapeda.com/search/part/RT9193-33GB/?ref=eda, SnapEDA_Link=https://www.snapeda.com/parts/RT9193-33GB/Richtek+USA+Inc./view-part/?ref=snap
"LDO 2": "Linear Voltage Regulator IC Positive Fixed 1 Output 1A SOT-223-3L", Package="SOT-223-3L UMW", Check_prices=https://www.snapeda.com/parts/AMS1117-3.3/UMW/view-part/?ref=eda, MF=UMW, MP=AMS1117-3.3, SnapEDA_Link=https://www.snapeda.com/parts/AMS1117-3.3/UMW/view-part/?ref=snap
LS1: library part AT-0927-TT-2-R, "AUDIO TRANSDUCER 3VP-P 70MA 20OHM 86DBA", Package=None, Availability=Unavailable, MF="{'manufacturer': u'PUI Audio, Inc.'}", MP=AT-0927-TT-2-R, Price=None
MircoSD: "Micro SD Card Socket", Package=None, Availability=Unavailable, MP=ST-TF-003A, Price=None
Q1: "BJT, SOT-23, 40V, 200mA, NPN, 0.35W, 150Â°C", Package="SOT-23 Diotec", Check_prices=https://www.snapeda.com/parts/MMBT3904/Diotec/view-part/?ref=eda, MF="Diotec Semiconductor", MP=MMBT3904, SnapEDA_Link=https://www.snapeda.com/parts/MMBT3904/Diotec/view-part/?ref=snap
R1 R2 R3 R4 R5 R6 R7 R8 R9 R10 R11 R12 R13 R14 R15 R16 R17 R18 R19 R20 R21 R22 R23 R24 R25 R26 R27 R28 R32 R33 R34 R35 R36: library part RC0805FR-075K1L, "5.1 kOhms Â±1% 0.125W, 1/8W Chip Resistor 0805 (2012 Metric) Moisture Resistant Thick Film", Package="0805-2 YAGEO", Check_prices=https://www.snapeda.com/parts/RC0805FR075K1L/Yageo/view-part/?ref=eda, MF=Yageo, MP=RC0805FR075K1L, SnapEDA_Link=https://www.snapeda.com/parts/RC0805FR075K1L/Yageo/view-part/?ref=snap
"Safety Switch": library part 434781025816, "6.2*4.1mm IP67 vertical type, SMT, height 2.5mm, Black silicone rubber actuator, 160gf, T&R", Package=None, Check_prices=https://www.snapeda.com/parts/434781025816/Wurth+Electronics/view-part/?ref=eda, MF="Wurth Elektronik", MP=434781025816, SnapEDA_Link=https://www.snapeda.com/parts/434781025816/Wurth+Electronics/view-part/?ref=snap
U1: "ARMÂ® CortexÂ®-M7 STM32H7 Microcontroller IC 32-Bit Single-Core 480MHz 2MB (2M x 8) FLASH 100-LQFP (14x14)", Package="LQFP-100 STMicroelectronics", Check_prices=https://www.snapeda.com/parts/STM32H743VIT6/STMicroelectronics/view-part/?ref=eda, MF=STMicroelectronics, MP=STM32H743VIT6, SnapEDA_Link=https://www.snapeda.com/parts/STM32H743VIT6/STMicroelectronics/view-part/?ref=snap
U5: "26-V 12-bit I2C output digital power monitor", Package="SOIC-8 Texas Instruments", Check_prices=https://www.snapeda.com/parts/INA219AIDR/Texas+Instruments/view-part/?ref=eda, MF="Texas Instruments", MP=INA219AIDR, SnapEDA_Link=https://www.snapeda.com/parts/INA219AIDR/Texas+Instruments/view-part/?ref=snap
U6: "4-Kbit (512 × 8) Serial (SPI) F-RAM", Manufacturer="Infineon Technologies", Manufacturer Order Number=FM25V05-G, PackageReference=PG-DSO-8-802
U9: "8-ch, 1.65-V to 3.6-V buffers with 3-state outputs", Package="SOIC-20 Texas Instruments", Check_prices=https://www.snapeda.com/parts/SN74LVC244ADWR/Texas+Instruments/view-part/?ref=eda, MF="Texas Instruments", MP=SN74LVC244ADWR, SnapEDA_Link=https://www.snapeda.com/parts/SN74LVC244ADWR/Texas+Instruments/view-part/?ref=snap
U10: "Single-Bit Dual-Supply Bus Transceiver with Configurable Voltage-Level Shifting and 3-State Outputs", Package="SOT-23-6 Texas Instruments", Check_prices=https://www.snapeda.com/parts/SN74LVC1T45DBVR/Texas+Instruments/view-part/?ref=eda, MF="Texas Instruments", MP=SN74LVC1T45DBVR, SnapEDA_Link=https://www.snapeda.com/parts/SN74LVC1T45DBVR/Texas+Instruments/view-part/?ref=snap
U11: "17V Clamp 5A (8/20Âµs) Ipp Tvs Diode Surface Mount SOT-23-6", Package="SOT-23-6 STMicroelectronics", Availability="In Stock", Check_prices=https://www.snapeda.com/parts/USBLC6-2SC6/STMicroelectronics/view-part/?ref=eda, MF=STMicroelectronics, MP=USBLC6-2SC6, Price=None, Purchase-URL=https://pricing.snapeda.com/search/part/USBLC6-2SC6/?ref=eda, SnapEDA_Link=https://www.snapeda.com/parts/USBLC6-2SC6/STMicroelectronics/view-part/?ref=snap
U12: "3.3 V CAN Transceiver with Standby Mode", Package="SOIC-8 Texas Instruments", Check_prices=https://www.snapeda.com/parts/SN65HVD230DR/Texas+Instruments/view-part/?ref=eda, MF="Texas Instruments", MP=SN65HVD230DR, SnapEDA_Link=https://www.snapeda.com/parts/SN65HVD230DR/Texas+Instruments/view-part/?ref=snap
Y1: library part ABM8G-24.000MHZ-B4Y-T, "24 MHz Â±30ppm Crystal 10pF 60 Ohms 4-SMD, No Lead", Package="SMD-4 Abracon", Availability="In Stock", Check_prices=https://www.snapeda.com/parts/ABM8G-24.000MHZ-B4Y-T/Abracon+LLC/view-part/?ref=eda, MF=Abracon, MP=ABM8G-24.000MHZ-B4Y-T, Price=None, Purchase-URL=https://pricing.snapeda.com/search/part/ABM8G-24.000MHZ-B4Y-T/?ref=eda, SnapEDA_Link=https://www.snapeda.com/parts/ABM8G-24.000MHZ-B4Y-T/Abracon+LLC/view-part/?ref=snap
Y2: library part CC7V-T1A-32.768KHZ-7PF-100PPM-TA-QC, "LOW FREQUENCY CRYSTAL", Package="SMD-2 Micro Crystal", Check_prices=https://www.snapeda.com/parts/CC7V-T1A-32.768KHZ-7PF-100PPM-TA-QC/Micro+Crystal/view-part/?ref=eda, Digi-Key_Part_Number=2195-CC7V-T1A-32.768KHZ-7PF-100PPM-TA-QCTR-ND, MF="Micro Crystal", MP=CC7V-T1A-32.768KHZ-7PF-100PPM-TA-QC, Purchase-URL=https://pricing.snapeda.com/search/part/CC7V-T1A-32.768KHZ-7PF-100PPM-TA-QC/?ref=eda, SnapEDA_Link=https://www.snapeda.com/parts/CC7V-T1A-32.768KHZ-7PF-100PPM-TA-QC/Micro+Crystal/view-part/?ref=snap

## Free pads (board coordinates)
  round 3 hole 3: 1(68.961,55.118) 1(68.961,94.996) 1(80.391,43.688) 1(80.391,106.299) 1(120.269,43.815) 1(120.269,106.299) 1(131.572,55.118) 1(131.699,94.996)

## Via types
v1: diameter 0.6, hole 0.3, Top Signal to Bottom Signal, tented both sides, 234 vias

## Nets (pads, with @x,y where several pads share a name; then routed paths per layer and width w, separated by ;. In a path a pad name is that pad's centre, name@x,y a point inside that pad or via, vN(x,y) a via of type N, cw(c..) or ccw(c..) an arc to the next point about the centre after c; other vN are vias at no path point)
+3.3: "LDO 2.2" "Safety Switch.1" ACCEL.1 C1.2 C2.2 C3.2 C4.2 C7.2 C9.2 C20.2 C21.2 C22.2 C23.2 C26.2 C27.1 C32.2 C33.2 C36.2 ERROR.A KERNEL.A MircoSD.4 R2.2 R4.1 R5.1 R6.1 R7.1 R8.1 R9.1 R10.1 R11.1 R12.1 R16.2 R23.1 R24.1 SAFE.A U1.6 U1.11 U1.27 U1.50 U1.75 U1.100 U5.5 U6.3 U6.7 U6.8 U9.20 U10.1 U12.3 | length 119.4
  Top Signal w0.38: v1(69.215,44.704) ERROR.A@69.215,46.219 ; R24.1@71.489,51.815 72.294,51.816 72.517,52.039 v1(72.517,53.467) ; KERNEL.A@73.787,46.219 73.787,45.308 74.01,45.085 v1(74.93,45.085) ; SAFE.A@76.073,46.219 76.073,45.308 76.296,45.085 v1(77.216,45.085) ; R10.1@83.058,91.262 83.058,89.797 83.133,89.722 v1(83.133,89.662) ; R9.1@86.36,91.262 86.36,89.933 86.521,89.773 v1(86.521,89.713) ; v1(87.258,58.917) 87.259,58.919 88.518,58.919 C20.2@88.519,58.92 ; v1(89.954,68.78) 89.996,68.738 89.996,68.299 90.424,67.871 U6.7@90.424,67.461 ; R8.1@91.296,91.336 91.322,91.311 v1(91.322,89.651) ; v1(94.107,89.662) 94.107,91.35 R12.1@94.115,91.358 ; C2.2@95.369,75.184 95.114,75.439 95.114,75.68 94.891,75.903 94.783,75.903 94.767,75.919 94.338,75.919 v1(94.296,75.961) 94.296,73.883 94.518,73.66 U1.50@98.139,73.66 ; R11.1@96.648,91.348 96.666,91.331 98.28,91.331 v1(98.298,91.313) ; U1.27@109.689,73.264 109.689,74.614 109.948,74.873 110.41,74.873 C3.2@110.665,75.128 ; U1.100@110.239,57.889 111.848,57.889 112.09,57.647 v1(112.15,57.647) ; C3.2@110.665,75.148 C3.2@110.665,75.128 ; v1(111.447,74.168) 111.405,74.21 111.405,74.65 111.182,74.873 110.92,74.873 C3.2@110.665,75.128 ; U1.11@111.869,64.584 110.205,64.584 109.85,64.229 109.85,62.316 110.073,62.094 111.86,62.094 U1.6@111.869,62.084 113.271,62.084 113.579,62.392 113.698,62.392 113.812,62.278 114.498,62.278 C7.2@114.681,62.095 ; v1@112.159,57.658 112.159,56.089 C4.2@112.214,56.035 ; C9.2@117.437,72.688 117.437,73.562 117.66,73.785 119.219,73.785 v1(119.261,73.827) 119.261,75.446 119.532,75.717 ACCEL.1@125.954,75.717 ; v1(123.902,44.255) 123.919,44.238 127.881,44.238 127.889,44.246
  Top Signal w0.5: C23.2@89.035,75.184 v1(89.036,76.189) ; U6.3@89.154,73.001 89.154,73.411 89.035,73.53 C23.2@89.035,75.184 R23.1@90.5,75.184 ; U6.7@90.424,67.461 U6.8@91.694,67.461 ; C36.2@93.345,53.458 93.459,53.572 97.543,53.572 97.544,54.313 97.536,54.321 U12.3@97.536,55.048 ; C1.2@94.615,58.031 94.785,58.201 96.065,58.201 96.389,58.525 96.389,58.733 96.427,58.771 U1.75@96.427,59.474
  Bottom Signal w0.38: C27.1@82.463,83.105 84.613,83.105 84.836,83.327 C26.2@84.836,84.074 ; v1(83.133,89.662) 83.171,89.7 85.179,89.7 R16.2@85.217,89.738 85.23,89.726 86.508,89.726 v1(86.521,89.713) 88.328,89.713 88.892,90.277 C21.2@88.892,90.297 88.893,90.298 88.893,91.881 C22.2@88.895,91.882 89.15,92.137 89.15,92.58 89.373,92.802 90.385,92.802 90.608,93.025 90.608,93.861 MircoSD.4@90.768,94.021 ; U10.1@83.2,66.31 C33.2@85.105,66.31 ; C26.2@84.77,84.301 84.997,84.074 89.151,84.074 89.373,84.297 89.373,85.098 89.535,85.26 89.535,85.45 88.794,86.191 88.369,86.191 v1(88.335,86.226) ; C33.2@85.105,66.179 85.265,66.179 86.058,66.972 86.461,66.972 v1(86.503,67.014) ; U5.5@85.414,56.642 87.026,56.642 87.249,56.865 v1@87.249,58.928 ; v1(94.296,75.961) 95.424,77.089 R6.1@96.596,77.089 R7.1@96.596,75.311 ; U9.20@100.906,61.849 103.224,61.849 C32.2@103.351,61.976 ; C32.2@103.302,61.926 103.356,61.872 v1(104.64,61.872) ; R4.1@111.811,61.468 R5.1@111.811,59.69 111.811,58.046 112.15,57.707 v1(112.15,57.647) ; R2.2@116.383,72.898 116.389,72.892 119.039,72.892 119.261,73.114 v1(119.261,73.827)
  other v1: 97.544,53.573 96.408,58.752 113.639,62.392
+5: "LDO 1.1" "LDO 1.3" "LDO 2.3" BOOT.1 C24.1 C25.2 C28.2 C34.2 C35.2 CAN.1 D3.C D5.1 GPS.1 IBUS.2 J2.P2 LS1.P OP.1 POWER.1 Tele.1 U10.6 | length 266.8
  Top Signal w0.5: v1(74.676,95.631) CAN.1@74.676,87.383 70.822,87.383 70.529,87.09 v1(70.529,82.172) 70.548,82.153 70.796,82.153 71.12,81.829 71.12,65.371 71.413,65.078 v1(74.745,65.078) ; v1(81.711,89.67) 81.711,87.368 82.004,87.075 91.714,87.075 91.794,86.995 v1(91.821,86.995) ; D3.C@95.504,43.027 96.963,43.027 97.625,43.689 C35.2@97.79,43.689 v1(97.79,42.418) ; v1(101.281,88.658) 101.308,88.658 101.931,89.281 120.537,89.281 120.83,89.574 120.83,95.211 121.123,95.504 v1(125.984,95.504) 129.501,95.504 129.794,95.797 BOOT.1@129.794,104.902 ; D5.1@121.793,61.74 121.804,61.75 POWER.1@126.01,61.75 126.01,58.459 125.718,58.166 v1(124.109,58.166) ; v1(130.302,57.023) 130.302,76.923 130.595,77.216 v1(132.715,77.216)
  Bottom Signal w0.5: LS1.P@70.263,102.997 70.263,100.122 J2.P2@70.09,99.949 70.09,97.423 71.882,95.631 77.685,95.631 77.978,95.338 77.978,89.955 78.271,89.662 80.11,89.662 80.118,89.67 v1(81.711,89.67) ; v1(70.529,82.172) 70.529,80.176 70.822,79.883 OP.1@74.676,79.883 ; v1(74.745,65.078) 74.745,66.32 IBUS.2@74.76,66.335 74.838,66.257 78.677,66.257 C34.2@78.755,66.179 78.846,66.27 80.65,66.27 U10.6@80.69,66.31 ; v1(91.821,86.995) 91.825,86.991 91.825,85.45 ; 91.825,85.26 91.825,85.45 ; v1(97.79,42.418) 100.926,42.418 101.219,42.711 101.219,45.152 101.512,45.445 113.898,45.445 114.22,45.767 Tele.1@114.22,49.784 122.301,49.784 122.601,50.084 C28.2@122.601,56.025 122.682,56.106 123.786,56.106 124.079,56.399 124.079,58.493 123.786,58.786 119.601,58.786 119.308,58.493 119.308,58.1 119.223,58.015 ; v1(101.281,88.658) 101.254,88.658 101.115,88.519 96.823,88.519 96.53,88.226 C24.1@96.53,86.01 96.434,86.106 94.745,86.106 C25.2@94.26,86.033 94.206,85.979 92.593,85.979 92.279,85.665 92.04,85.665 91.825,85.45 ; 117.343,58.015 117.428,57.93 117.428,57.062 117.721,56.769 118.845,56.769 119.138,57.062 119.138,58.18 ; v1(124.109,58.166) 130.009,58.166 130.302,57.873 v1(130.302,57.023) ; v1(125.984,95.504) 125.984,88.366 GPS.1@125.954,88.336 128.612,88.336 128.905,88.629 128.905,89.242 129.198,89.535 132.422,89.535 132.715,89.242 v1(132.715,77.216)
AUX_OUT_1: U9.9
AUX_OUT_2: U9.7
AUX_OUT_3: U9.5
AUX_OUT_4: U9.3
AUX_PWM_1: U1.58 U9.11 | length 9.3
  Top Signal w0.2: U1.58@96.509,68.084 96.549,68.124 97.893,68.124 98.01,68.241 98.01,69.045 v1(98.051,69.087)
  Bottom Signal w0.2: v1(98.051,69.087) 98.015,69.123 98.015,71.13 98.132,71.247 99.07,71.247 99.187,71.364 99.187,73.162 99.304,73.279 U9.11@100.906,73.279
AUX_PWM_2: U1.59 U9.13 | length 7.2
  Top Signal w0.2: U1.59@96.509,67.584 98.26,67.584 98.757,68.081 v1(98.813,68.081)
  Bottom Signal w0.2: v1(98.813,68.081) 98.806,68.088 98.806,70.622 98.923,70.739 U9.13@100.906,70.739
AUX_PWM_3: U1.60 U9.15 | length 5.3
  Top Signal w0.2: U1.60@96.509,67.084 96.513,67.088 98.809,67.088 v1(98.813,67.091)
  Bottom Signal w0.2: v1(98.813,67.091) 98.874,67.152 99.324,67.152 99.441,67.27 99.441,68.082 99.558,68.199 U9.15@100.906,68.199
AUX_PWM_4: U1.61 U9.17 | length 4.8
  Top Signal w0.2: U1.61@96.509,66.584 98.331,66.584 v1(98.818,66.097)
  Bottom Signal w0.2: v1(98.818,66.097) 99.256,65.659 U9.17@100.906,65.659
BARO1_CS: BARO1.6 R13.2 U1.35 | length 24.7
  Top Signal w0.2: v1(100.203,80.518) 100.203,80.41 100.33,80.283 100.33,75.845 101.714,74.462 105.572,74.462 105.689,74.345 U1.35@105.689,73.264 ; BARO1.6@105.919,77.347 105.923,77.343 107.325,77.343 107.442,77.46 107.442,80.137 R13.2@106.147,80.137
  Bottom Signal w0.2: v1(100.203,80.518) 106.974,80.518 107.355,80.137 v1(107.4,80.137)
BARO2_CS: BARO2.6 R15.2 U1.93 | length 16.7
  Top Signal w0.16: U1.93@106.689,57.904 106.689,56.506 106.807,56.388 108.745,56.388 108.839,56.294 R15.2@108.839,55.423
  Top Signal w0.2: v1(103.441,53.657) 103.441,54.66 103.559,54.777 BARO2.6@104.639,54.777 ; R15.2@108.839,55.423 108.839,54.6 108.956,54.483 110.119,54.483 110.236,54.366 v1(110.236,53.594)
  Bottom Signal w0.2: v1(103.441,53.657) 110.172,53.657 v1(110.236,53.594)
BATT_CURRENT_SENS: U1.25
BATT_VOLTAGE_SENS: U1.24
BUZZER: R28.2 U1.62 | length 78
  Top Signal w0.2: v1(78.74,96.774) 78.74,86.223 78.623,86.106 71.752,86.106 71.635,85.989 71.635,81.27 71.752,81.153 78.89,81.153 79.007,81.036 v1(79.007,72.869) ; v1(94.347,67.422) 95.645,66.124 96.469,66.124 U1.62@96.509,66.084
  Bottom Signal w0.2: R28.2@71.501,105.613 71.501,104.521 72.263,103.759 72.263,96.891 72.38,96.774 v1(78.74,96.774) ; v1(79.007,72.869) 79.717,73.579 86.497,73.579 86.614,73.461 86.614,67.681 86.816,67.479 94.29,67.479 v1(94.347,67.422)
CAN1_RX: U1.81 U12.4 | length 6.8
  Top Signal w0.2: U12.4@96.266,55.048 96.266,55.733 96.92,56.387 100.514,56.387 100.689,56.562 U1.81@100.689,57.904
CAN1_TX: U1.82 U12.1 | length 3.9
  Top Signal w0.2: U12.1@100.076,55.048 101.072,55.048 101.189,55.165 U1.82@101.189,57.904
CAN2_TX: U1.92
CAN_N: CAN.3 R32.2 U12.6 | length 78
  Top Signal w0.16: R32.2@78.74,82.753 78.74,83.443 78.834,83.537 79.364,83.537 79.698,83.203 79.698,59.403 79.375,59.08 v1(79.375,59.055)
  Top Signal w0.2: v1(81.637,55.751) 81.637,55.734 81.225,55.322 81.225,51.998 82.55,50.673 82.55,43.932 82.794,43.688 93.749,43.688 94.072,43.364 94.072,41.646 94.19,41.529 99.324,41.529 99.441,41.646 99.441,47.381 99.324,47.498 98.318,47.498 97.995,47.822 97.995,49.106 97.878,49.223 97.736,49.223 97.536,49.423 U12.6@97.536,50.108
  Top Signal w0.254: CAN.3@74.676,82.383 74.716,82.423 78.41,82.423 R32.2@78.74,82.753
  Bottom Signal w0.2: v1(79.375,59.055) 79.375,59.006 79.643,58.738 79.643,55.443 80.127,54.96 80.846,54.96 v1(81.637,55.751)
CAN_P: CAN.2 R32.1 U12.7 | length 77.9
  Top Signal w0.16: R32.1@78.49,84.883 R32.1@78.74,84.633 78.74,83.943 78.834,83.849 79.493,83.849 80.01,83.332 80.01,59.374 80.264,59.12 v1(80.264,59.055)
  Top Signal w0.2: v1(80.683,55.751) 80.683,55.643 80.872,55.453 80.872,51.852 82.197,50.527 82.197,43.786 82.648,43.336 93.603,43.336 93.72,43.218 93.72,41.5 94.044,41.177 99.47,41.177 99.793,41.5 99.793,47.527 99.47,47.85 98.464,47.85 98.347,47.968 98.347,49.106 98.464,49.223 98.606,49.223 98.806,49.423 U12.7@98.806,50.108
  Top Signal w0.254: CAN.2@74.676,84.883 R32.1@78.49,84.883
  Bottom Signal w0.2: v1(80.264,59.055) 80.264,59.006 79.996,58.738 79.996,55.589 80.273,55.312 80.438,55.312 80.606,55.48 80.606,55.674 v1(80.683,55.751)
FMU-SWCLK: BOOT.2 U1.76 | length 144.5
  Top Signal w0.16: v1(92.841,56.694) 92.864,56.717 98.077,56.717 98.171,56.81 98.171,57.885 U1.76@98.189,57.904 ; v1(97.282,78.867) 97.282,89.372 97.445,89.535 v1(99.314,89.535) ; v1(115.443,103.886) 115.443,99.395 115.537,99.301 v1(122.774,99.301)
  Top Signal w0.254: v1(122.774,99.301) 123.549,99.301 123.698,99.45 123.698,107.823 123.974,108.099 128.629,108.099 128.778,107.95 BOOT.2@128.778,106.934
  Bottom Signal w0.16: v1(92.841,56.694) 92.856,56.708 92.856,61.12 92.657,61.319 89.121,61.319 89.027,61.413 89.027,61.628 88.933,61.722 82.423,61.722 81.661,62.484 71.976,62.484 71.882,62.578 71.882,67.47 71.976,67.564 77.63,67.564 77.724,67.658 77.724,74.327 77.851,74.454 92.997,74.454 93.091,74.548 93.091,78.773 93.185,78.867 v1(97.282,78.867) ; v1(99.314,89.535) 107.094,89.535 107.188,89.629 107.188,103.792 107.282,103.886 v1(115.443,103.886)
FMU-SWDIO: BOOT.3 U1.72 | length 114.8
  Top Signal w0.254: v1(82.105,69.473) 82.116,69.461 82.116,59.075 v1(82.128,59.063) ; v1(82.147,72.779) 82.147,76.158 81.661,76.645 81.661,78.845 81.81,78.994 96.568,78.994 96.716,79.143 96.716,89.837 96.923,90.043 98.597,90.043 v1(99.325,90.771) ; v1(92.828,55.723) 92.351,55.723 92.202,55.872 92.202,60.935 92.351,61.084 U1.72@96.509,61.084 ; v1(103.886,90.805) 119.866,90.805 120.015,90.954 120.015,96.117 120.164,96.266 127.486,96.266 127.635,96.415 BOOT.3@127.635,104.902
  Bottom Signal w0.254: v1(82.105,69.473) 82.126,69.494 82.126,72.728 v1@82.169,72.771 ; v1(82.128,59.063) 82.128,57.08 83.963,55.245 92.342,55.245 92.82,55.723 v1(92.828,55.723) ; v1(99.325,90.771) 99.342,90.788 103.869,90.788 v1(103.886,90.805)
FMU_ACT_LED: R35.2 U1.84 | length 46.2
  Top Signal w0.254: v1(73.66,53.467) 73.66,51.9 R35.2@73.798,51.762 ; v1(101.6,46.921) 101.614,46.935 102.041,46.935 102.189,47.084 U1.84@102.189,57.904
  Bottom Signal w0.254: v1(73.66,53.467) 73.726,53.533 73.921,53.533 73.982,53.594 92.348,53.594 92.511,53.43 92.511,49.665 95.059,47.117 101.31,47.117 101.506,46.921 v1(101.6,46.921)
FMU_ERR_LED: R36.2 U1.85 | length 53.2
  Top Signal w0.254: R36.2@69.215,51.791 69.215,53.064 69.364,53.213 71.352,53.213 71.501,53.362 v1(71.501,54.102) ; U1.85@102.689,57.904 102.677,57.891 102.677,47.195 102.901,46.971 103.072,46.971 v1(103.139,46.905)
  Bottom Signal w0.254: v1(71.501,54.102) 92.834,54.102 92.983,53.953 92.983,49.765 95.067,47.68 102.99,47.68 103.139,47.532 v1(103.139,46.905)
FMU_USART6_RX: U1.64 U10.3 | length 20.1
  Top Signal w0.2: v1(93.472,65.151) 93.539,65.084 U1.64@96.509,65.084
  Bottom Signal w0.2: U10.3@83.2,64.41 83.111,64.321 82.413,64.321 82.296,64.204 82.296,62.326 82.554,62.068 88.402,62.068 88.519,62.185 88.519,64.992 88.636,65.109 93.43,65.109 v1(93.472,65.151)
FMU_USART6_TX: U1.63
FPGA_CS: ACCEL.3 U1.3 | length 43.5
  Top Signal w0.2: U1.3@111.869,60.584 111.874,60.579 112.949,60.579 113.262,60.266 113.262,59.965 v1(113.606,59.621) ; ACCEL.3@125.954,80.717 126.037,80.8 v1(129.501,80.8)
  Bottom Signal w0.2: v1(113.606,59.621) 113.639,59.654 114.206,59.654 114.317,59.764 129.839,59.764 129.956,59.881 129.956,80.337 129.501,80.792 v1(129.501,80.8)
FPGA_SPI_MISO: ACCEL.5 U1.4 | length 48.9
  Top Signal w0.2: U1.4@111.869,61.084 111.88,61.073 112.964,61.073 113.538,60.499 114.056,60.499 v1(114.119,60.436) ; ACCEL.5@125.95,85.767 125.984,85.733 v1(129.518,85.733)
  Bottom Signal w0.2: v1(114.119,60.436) 114.177,60.436 114.493,60.12 129.463,60.12 129.58,60.237 129.58,80.02 129.463,80.137 128.991,80.137 128.874,80.254 128.874,81.417 128.991,81.534 129.804,81.534 129.921,81.651 129.921,85.354 129.804,85.471 129.794,85.471 v1@129.54,85.725
FPGA_SPI_MOSI: ACCEL.4 U1.5 | length 44.9
  Top Signal w0.2: U1.5@111.869,61.584 113.27,61.584 113.522,61.332 v1(113.63,61.332) ; ACCEL.4@125.954,83.217 125.974,83.198 v1(129.298,83.198)
  Bottom Signal w0.2: v1(113.63,61.332) 114.309,61.332 114.808,60.833 114.808,60.587 114.925,60.47 129.073,60.47 129.19,60.587 129.19,79.639 129.073,79.756 128.778,79.756 128.524,80.01 128.524,81.661 128.778,81.915 129.169,81.915 129.286,82.032 v1@129.286,83.185
FPGA_SPI_SCK: ACCEL.6 U1.1 | length 52.8
  Top Signal w0.2: U1.1@111.869,59.584 111.869,58.921 111.987,58.804 v1(114.101,58.804) ; ACCEL.6@125.95,88.267 125.961,88.256 v1(130.393,88.256)
  Bottom Signal w0.2: v1(114.101,58.804) 114.177,58.88 114.177,59.128 114.452,59.404 130.257,59.404 130.374,59.521 130.374,88.237 v1(130.393,88.256)
FRAM_CS: R23.2 U1.51 U6.1 | length 10.8
  Top Signal w0.254: U6.1@91.694,73.411 U6.1@91.694,73.001 92.18,73.001 92.329,73.15 92.329,75.133 R23.2@92.38,75.184 ; R23.2@92.329,75.184 93.196,75.184 93.345,75.035 93.345,71.746 93.494,71.597 96.496,71.597 U1.51@96.509,71.584